# Altium PCB flight controller.PcbDoc (part 1 of 3)
Units mm, origin at the board's own origin, x right, y up, seen from the top; angles counter-clockwise.
Board outline 45 x 47 mm, 6 copper layers (Top Layer, GND Layer, PWR Layer, Layer 4, Layer 5, Bottom Layer), stack 1.786 mm thick; 82 components, 123 nets, 711 pads, 295 vias.
Unrouted connection lines stored in the file: 14.
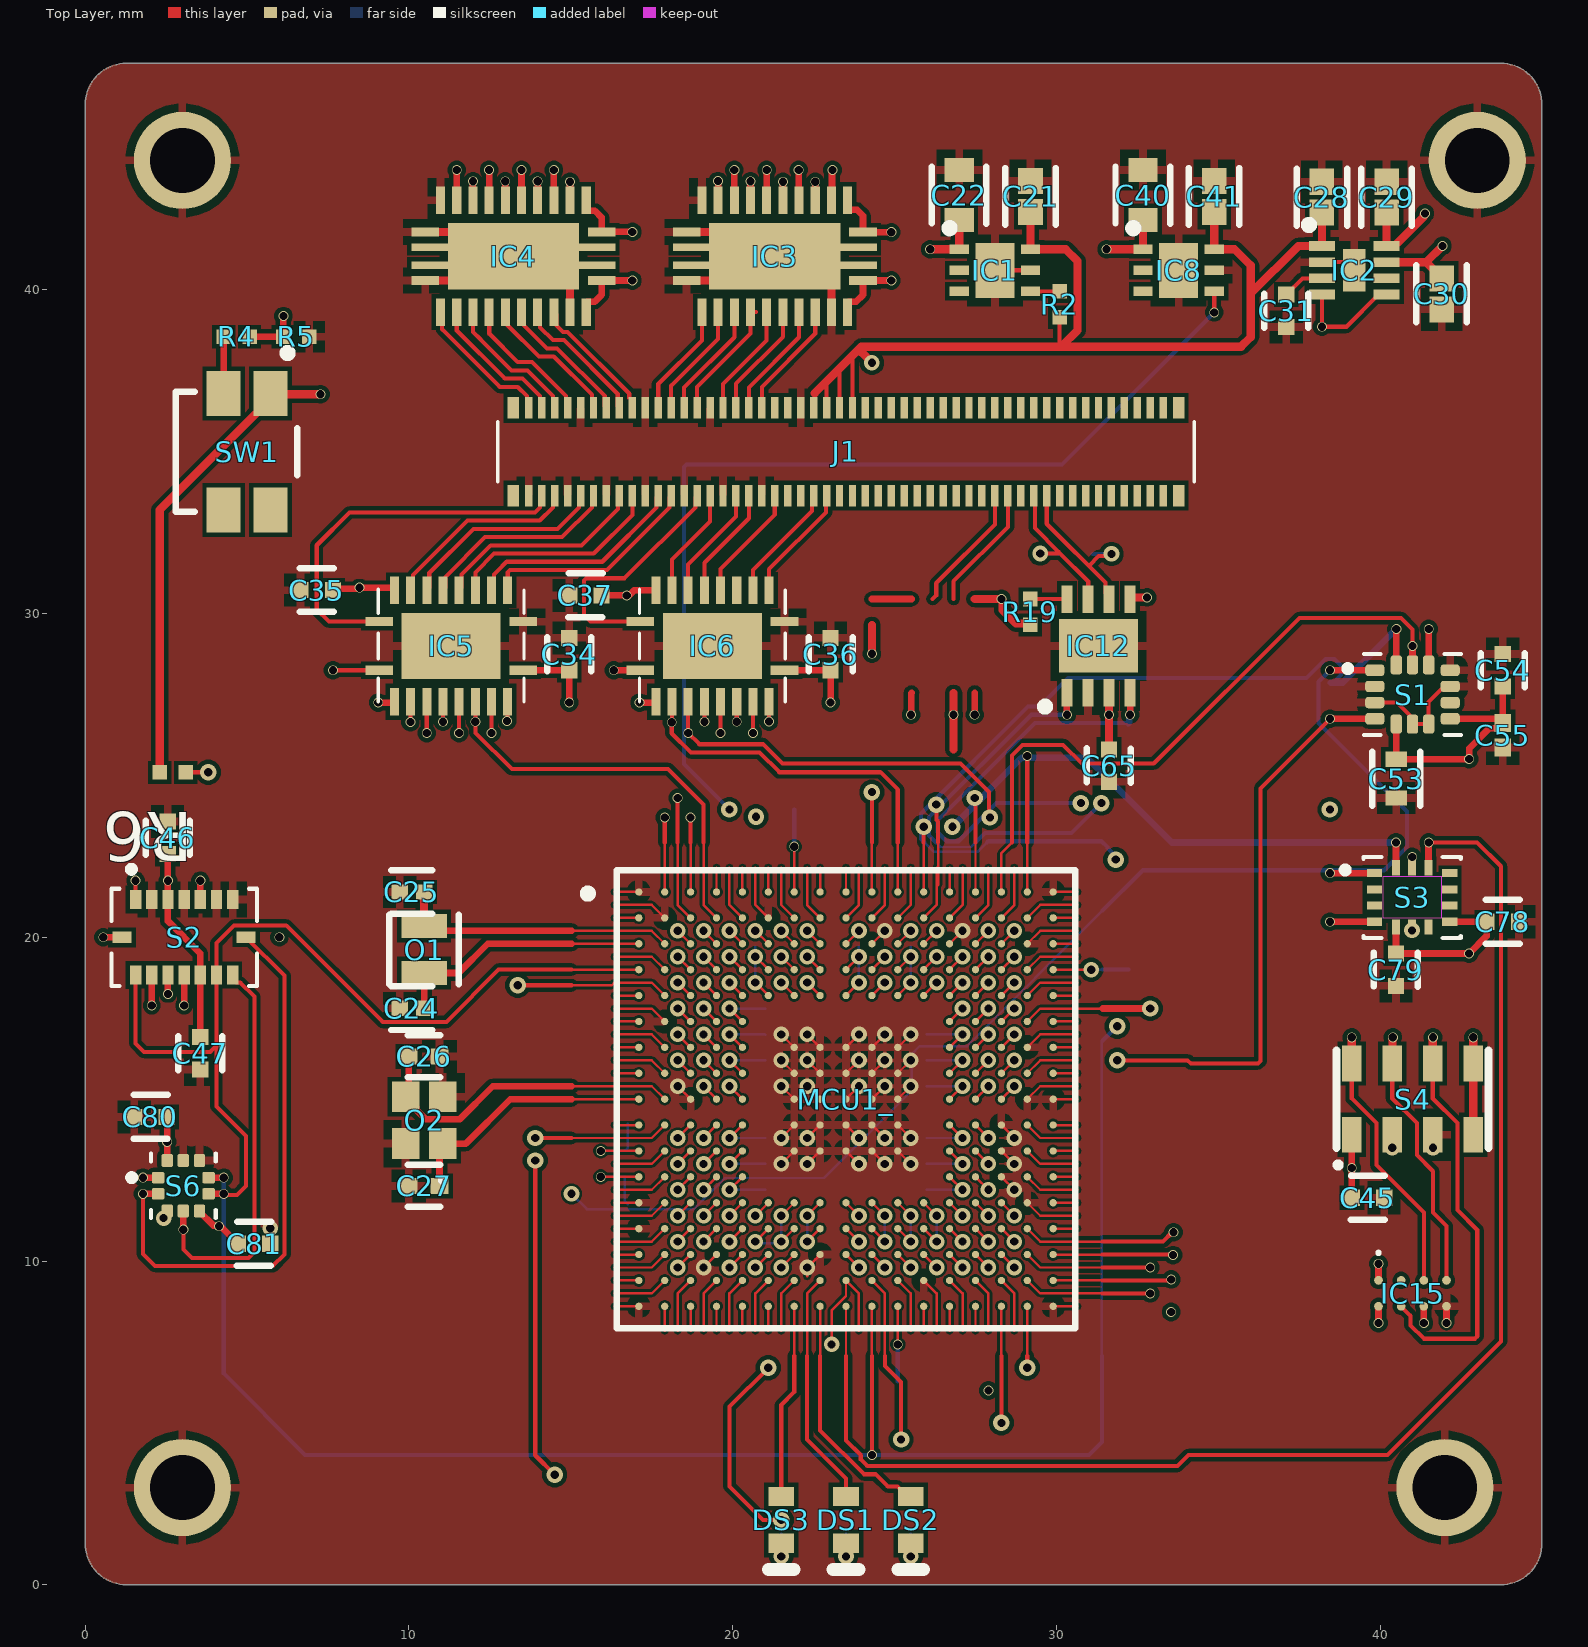
[diagram p0: Top Layer view]
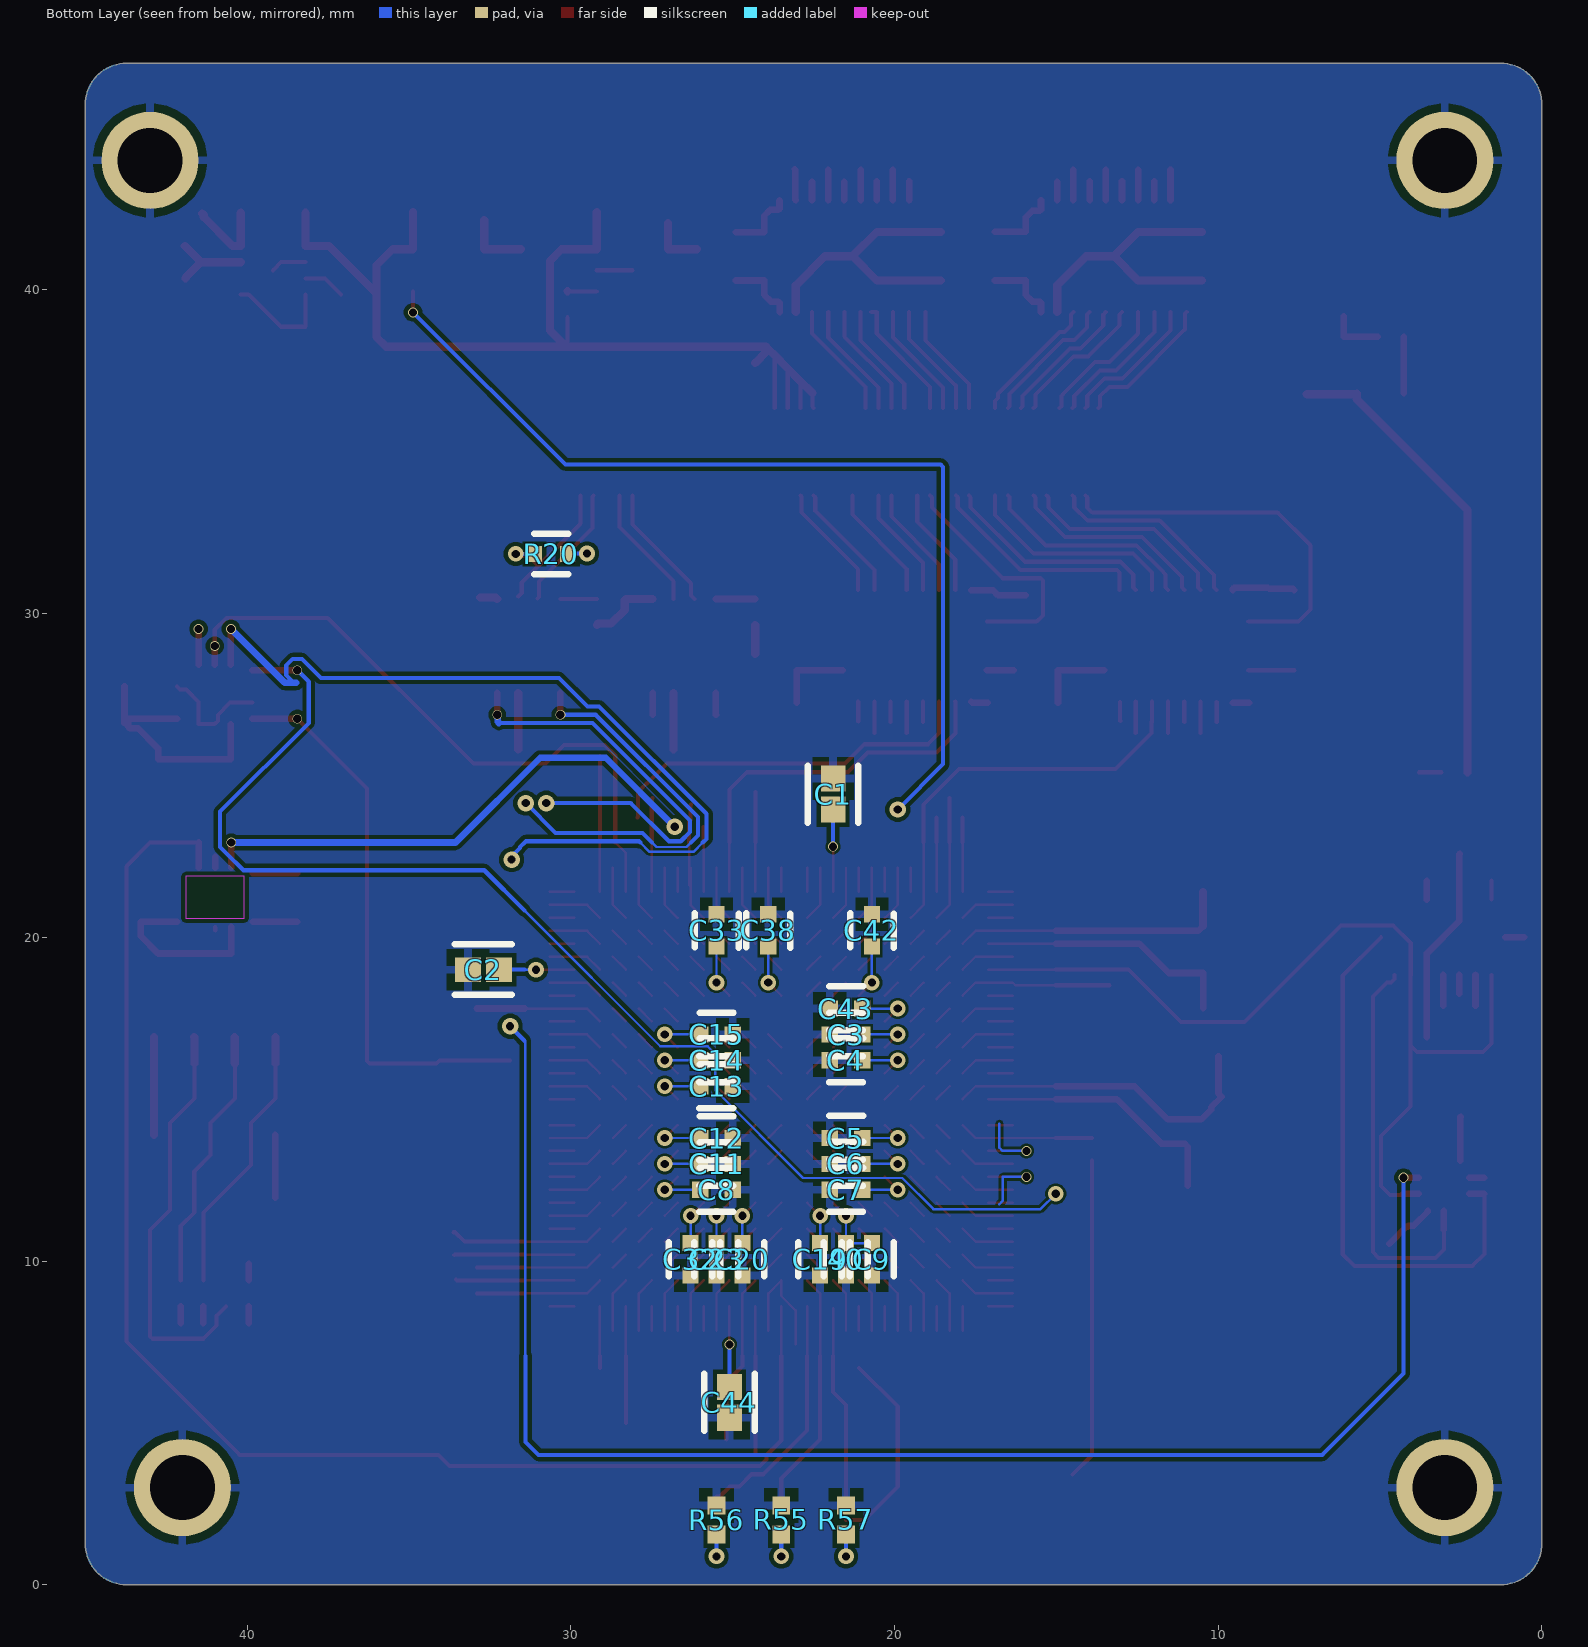
[diagram p1: Bottom Layer view, seen from below]
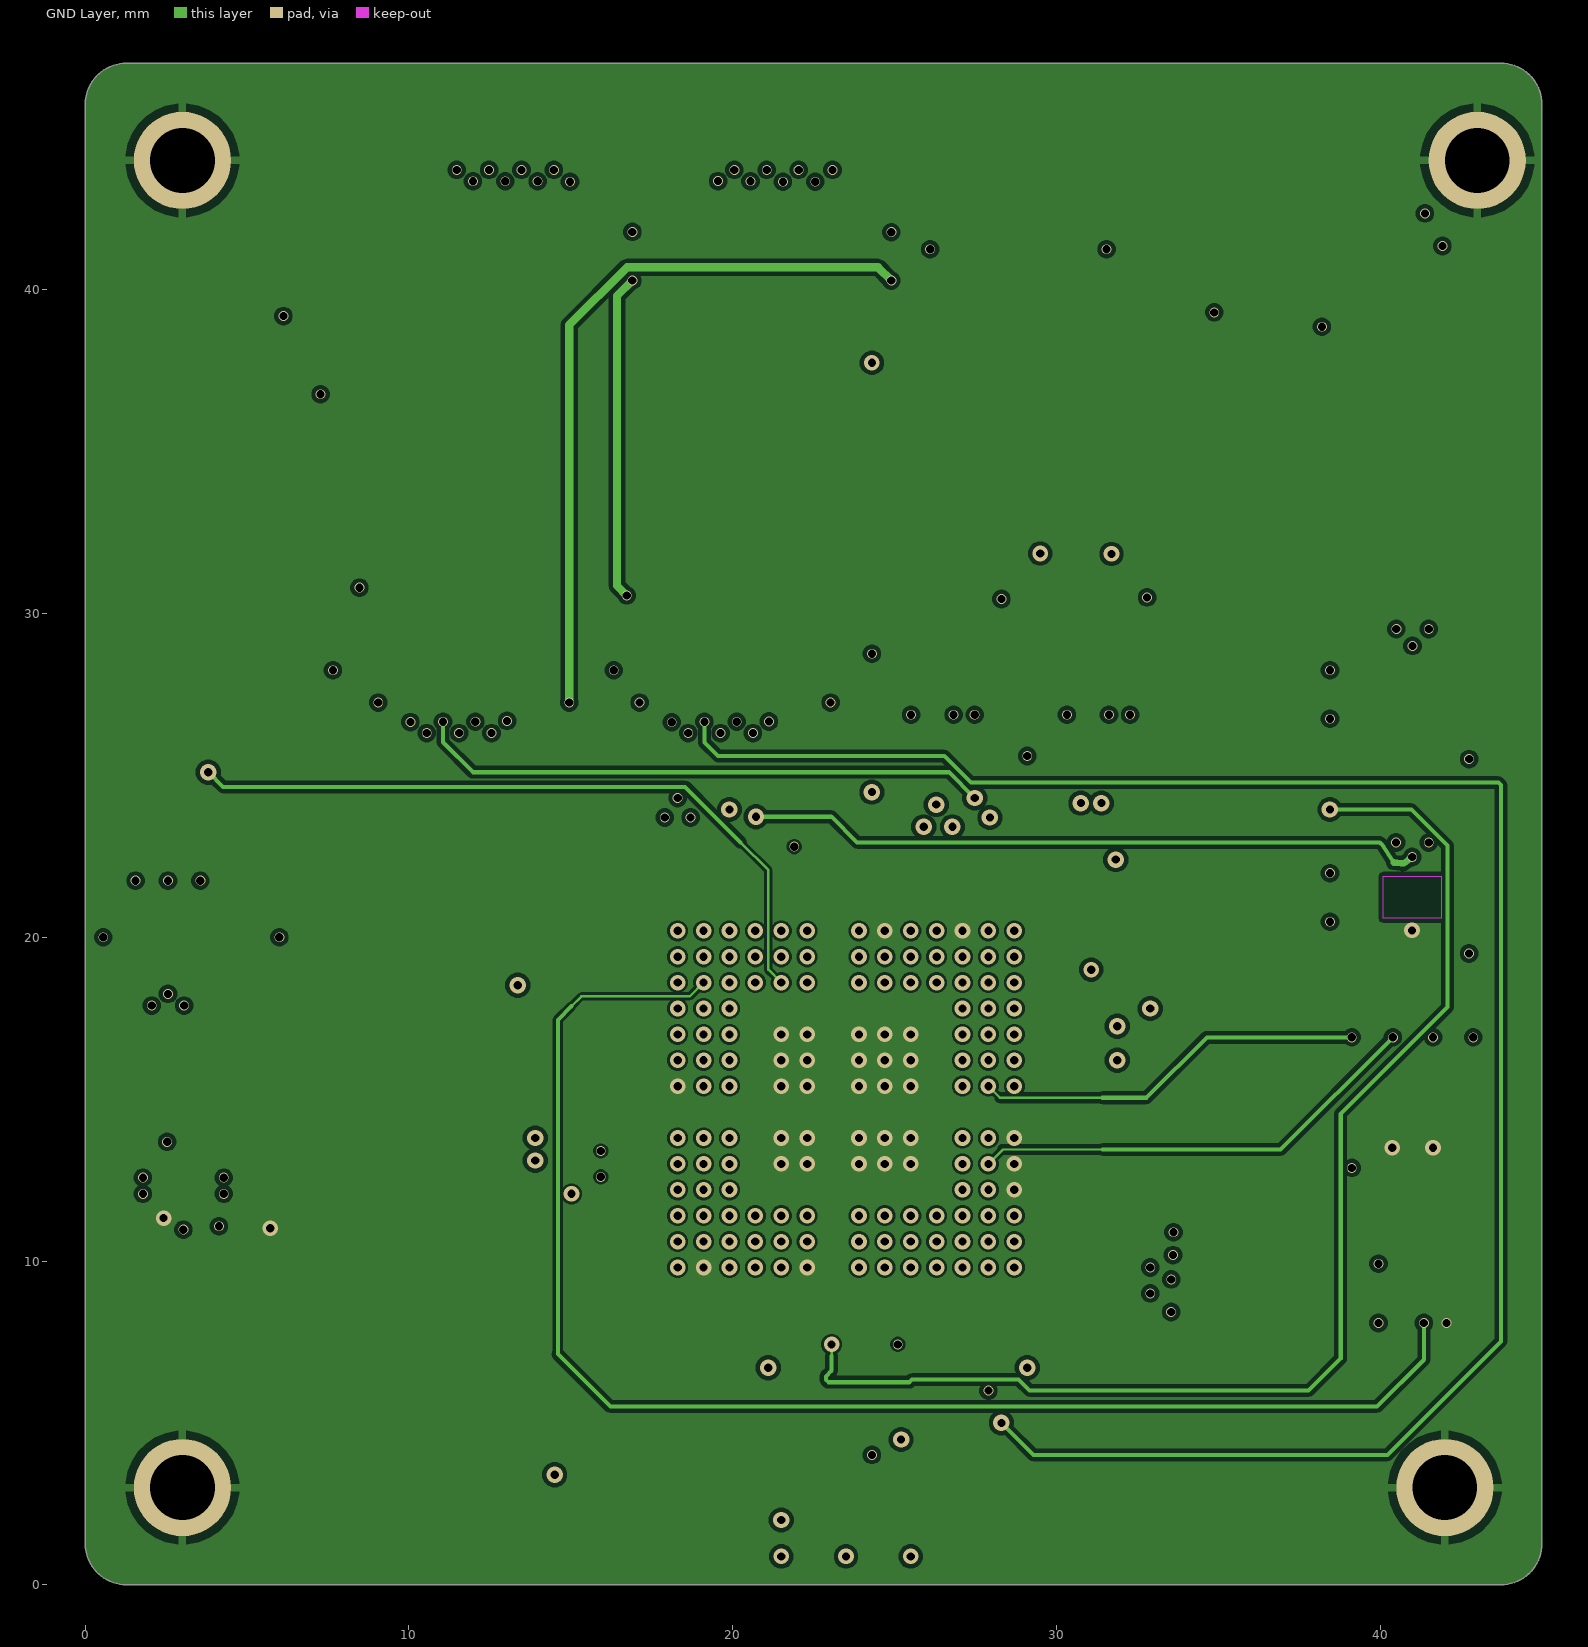
[diagram p2: GND Layer]
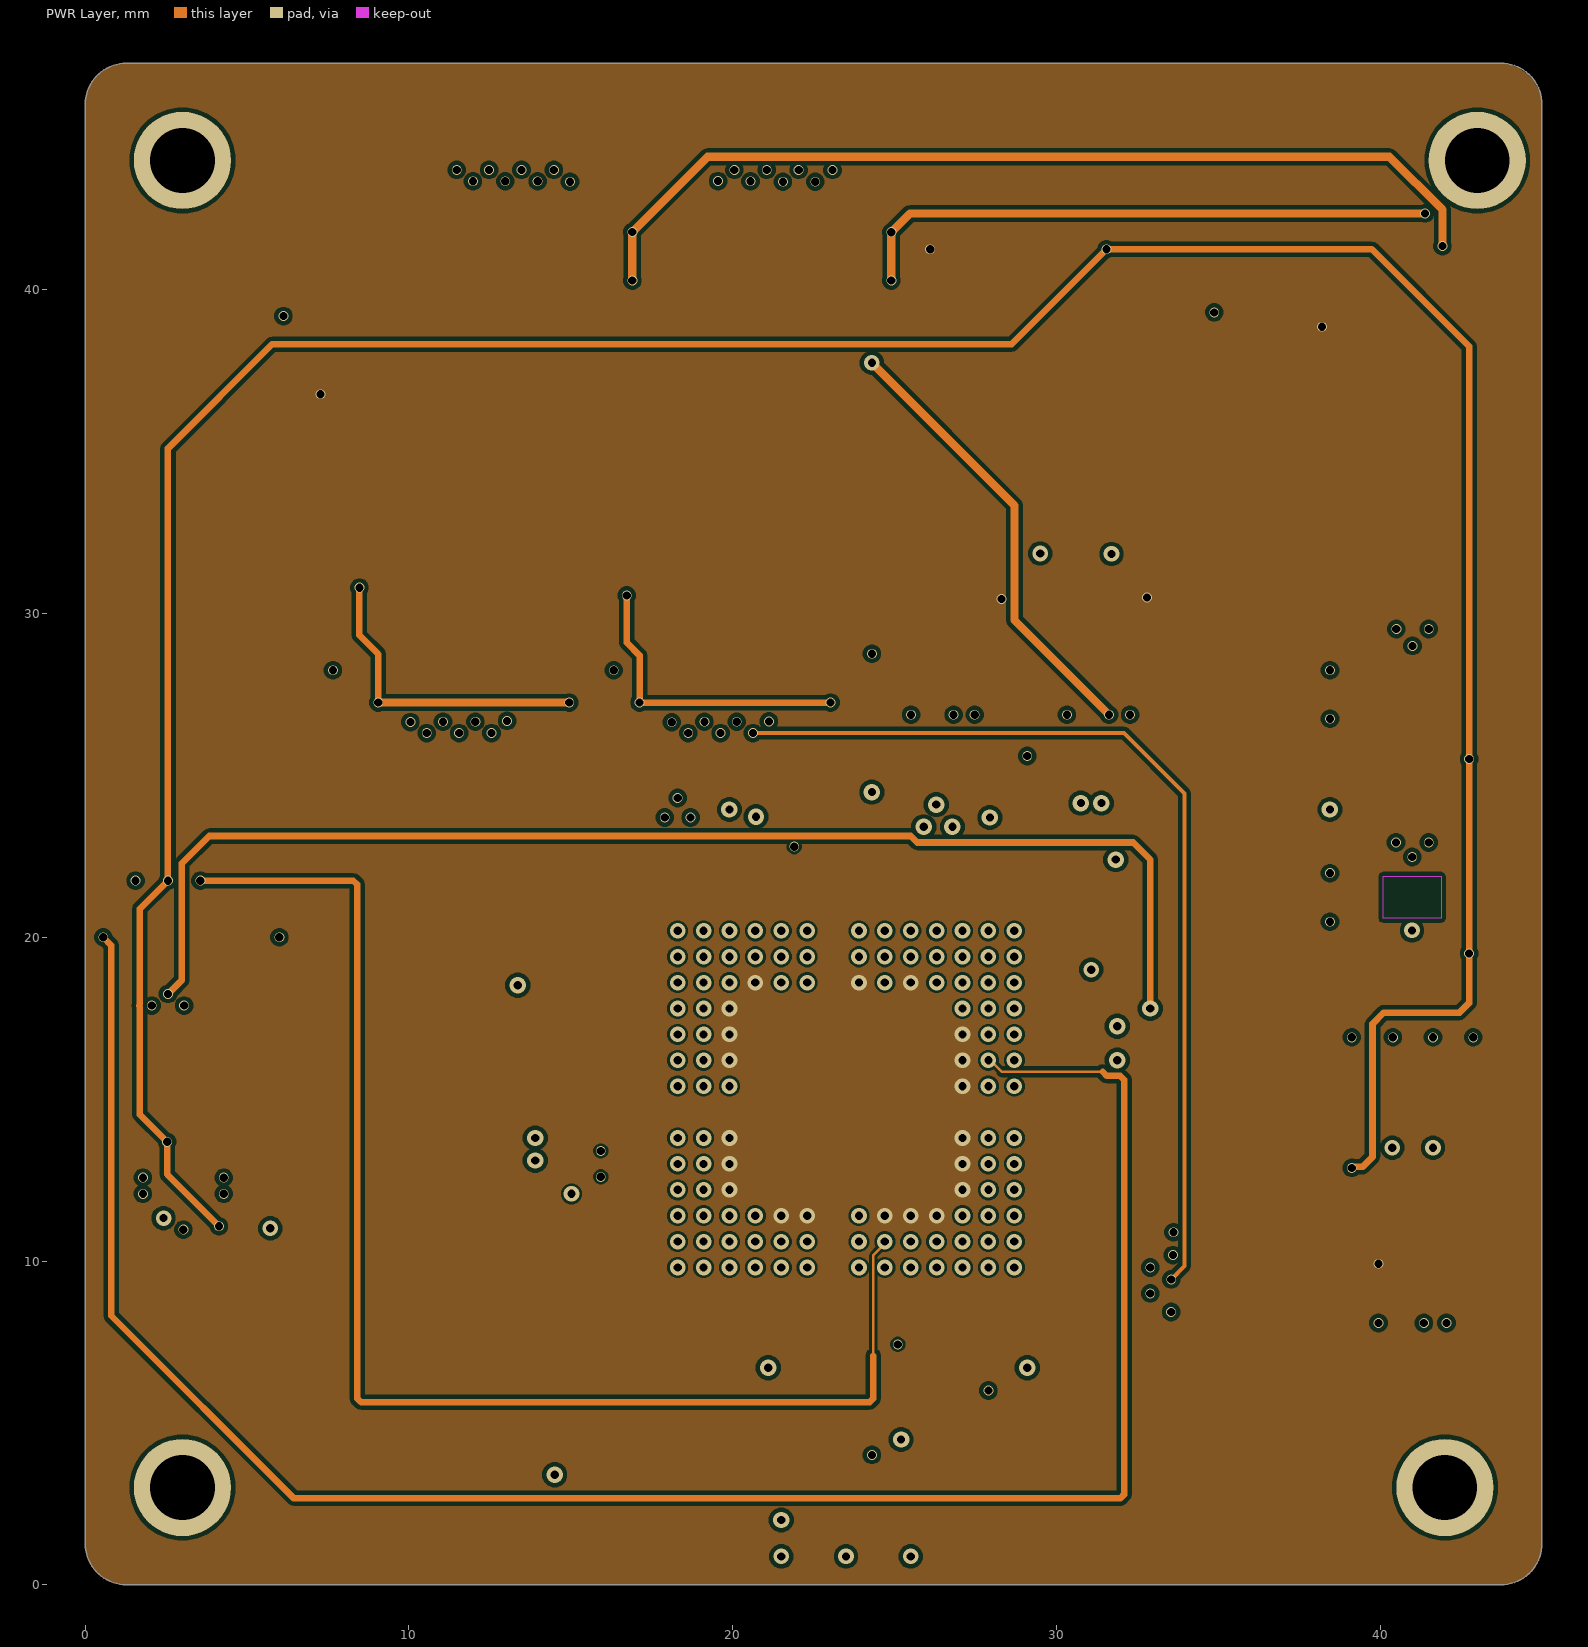
[diagram p3: PWR Layer]
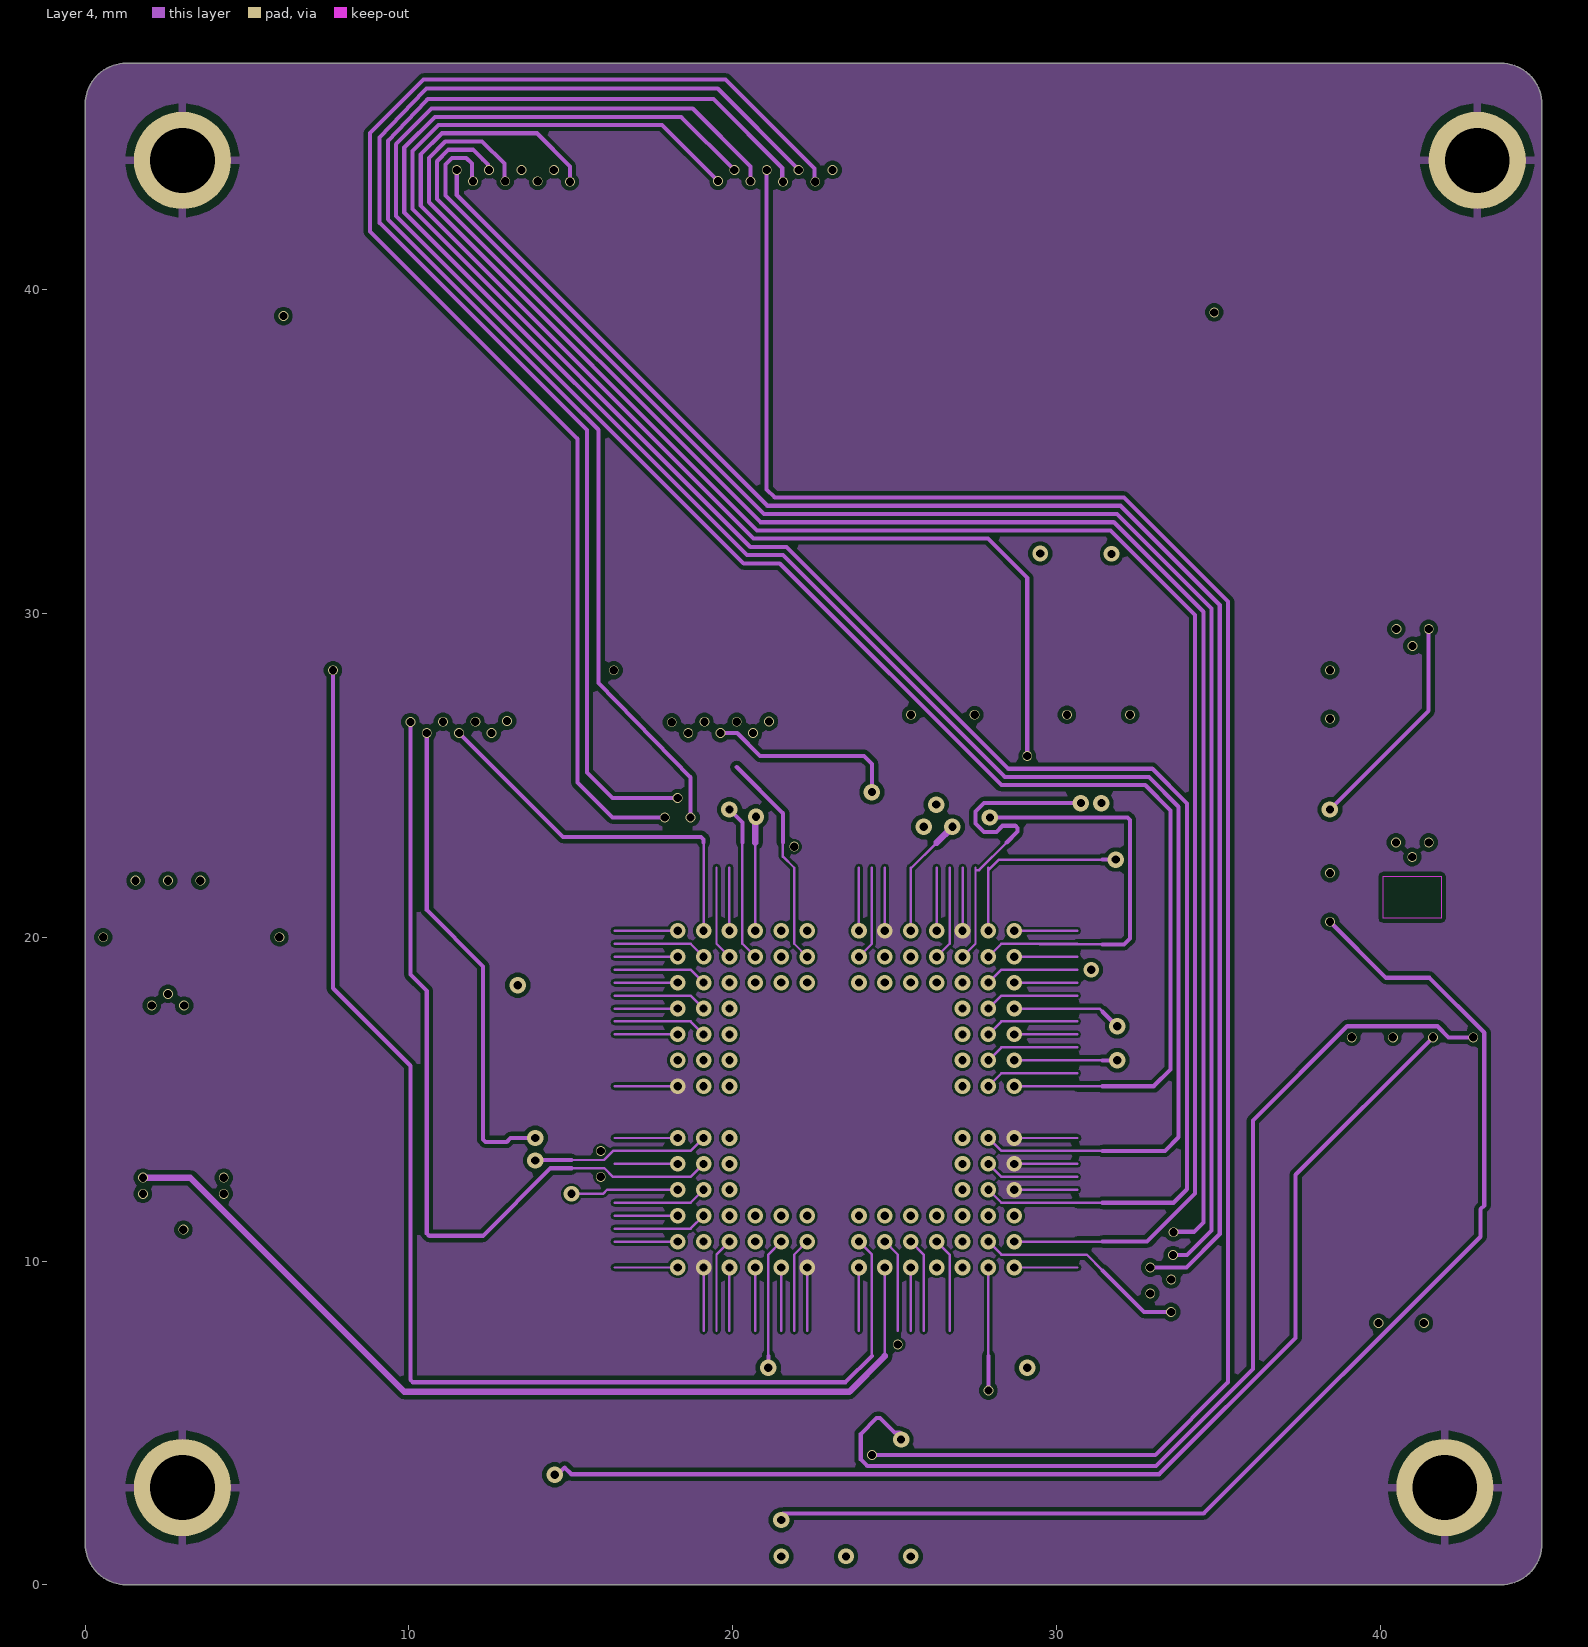
[diagram p4: Layer 4]
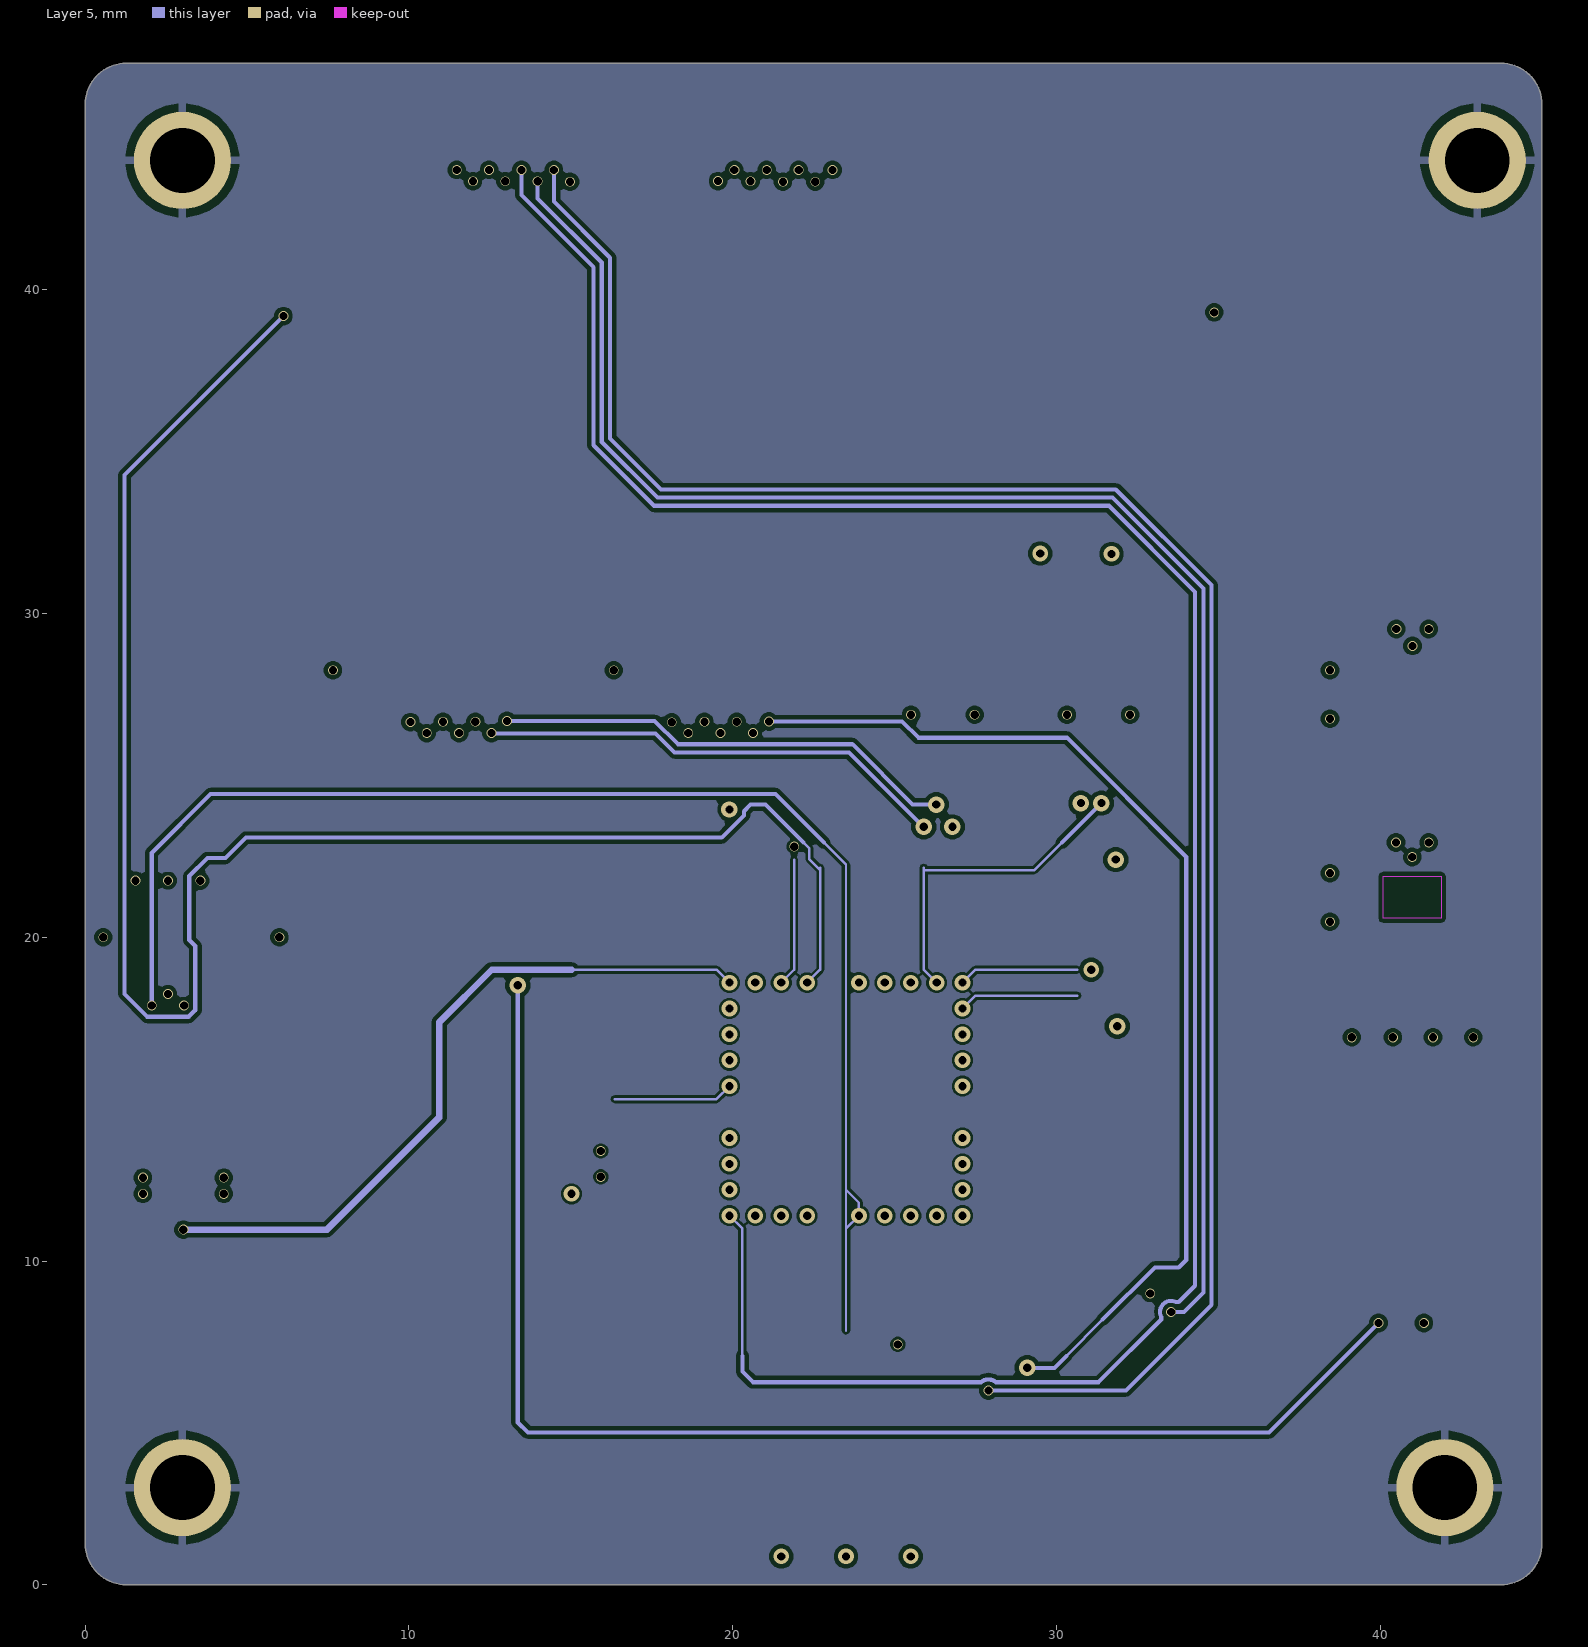
[diagram p5: Layer 5]

## Layer stack, top to bottom
Top Solder: solder mask 0.0127, Solder Resist, Dk 3.3
Top Layer: signal copper 0.035
Dielectric 2: core 0.1524, PP-006, Dk 4.1
GND Layer: signal copper 0.035
Dielectric 4: prepreg 0.254, PP-006, Dk 4.1
PWR Layer: signal copper 0.0356
Dielectric 1: core 0.762, FR-4, Dk 4.5
Layer 4: signal copper 0.0356
Dielectric 5: prepreg 0.254, PP-006, Dk 4.1
Layer 5: signal copper 0.035
Dielectric 3: core 0.1524, PP-006, Dk 4.1
Bottom Layer: signal copper 0.035
Bottom Solder: solder mask 0.0127, Solder Resist, Dk 3.3

## Board outline
0,1.27 ccw(c1.27,1.27) 1.27,0 43.73,0 ccw(c43.73,1.27) 45,1.27 45,45.73 ccw(c43.73,45.73) 43.73,47 1.27,47 ccw(c1.27,45.73) 0,45.73

## Design rules (kind name [scope] priority, off if disabled: settings)
Clearance Clearance_h743 [WithinRoom('h743')] p1: gap=0.076 ignorepadtopadclearanceinfootprint=TRUE
Clearance [All] p2: gap=0.127 ignorepadtopadclearanceinfootprint=TRUE
DiffPairsRouting [All] p1: maxlimit=0.254 minlimit=0.254 mostfreqgap=0.254 toplayer_minwidth=0.254 toplayer_maxwidth=0.254 toplayer_prefwidth=0.254 midlayer1_minwidth=0.254 midlayer1_maxwidth=0.254 midlayer1_prefwidth=0.254 midlayer2_minwidth=0.254 midlayer2_maxwidth=0.254 midlayer2_prefwidth=0.254 midlayer3_minwidth=0.254 midlayer3_maxwidth=0.254 midlayer3_prefwidth=0.254 midlayer4_minwidth=0.254 midlayer4_maxwidth=0.254 midlayer4_prefwidth=0.254 bottomlayer_minwidth=0.254 bottomlayer_maxwidth=0.254 bottomlayer_prefwidth=0.254 maxuncoupledlength=12.7
HoleSize [All] p1: absolutevalues=TRUE maxlimit=7.62 minlimit=0.254 maxpercent=80.000 minpercent=20.000
MinimumAnnularRing [All] p1: minimumring=0.254
PasteMaskExpansion [All] p1: expansion=0.254
PlaneClearance [All] p1: clearance=0.381
PlaneConnect [All] p1: pad.planeconnectstyle=Relief pad.reliefexpansion=0.508 pad.reliefentries=4 pad.reliefconductorwidth=0.254 pad.reliefairgap=0.254 via.planeconnectstyle=Direct via.reliefexpansion=0.508 via.reliefentries=4 via.reliefconductorwidth=0.254 via.reliefairgap=0.254
PolygonConnect [All] p1: thpad.connectstyle=Relief thpad.reliefconductorwidth=0.254 thpad.reliefentries=4 thpad.polygonreliefangle="90 Angle" thpad.airgapwidth=0.254 smdpad.connectstyle=Relief smdpad.reliefconductorwidth=0.254 smdpad.reliefentries=4 smdpad.polygonreliefangle="90 Angle" smdpad.airgapwidth=0.254 via.connectstyle=Direct via.reliefconductorwidth=0.254 via.reliefentries=4 via.polygonreliefangle="90 Angle" via.airgapwidth=0.254
RoomDefinition h743 [InComponentClass('S1_MCU')] p1: confinementstyle=ConfineIn formatcopy=TRUE lockcomponents=TRUE outline 14.521,7.071 14.521,22.929 30.929,22.929 30.929,7.071
RoutingVias RoutingVias_h743 [WithinRoom('h743')] p1: holewidth=0.254 width=0.483 viastyle="Through Hole" minholewidth=0.254 minwidth=0.483 maxholewidth=0.254 maxwidth=0.483
RoutingVias [All] p2: holewidth=0.254 width=0.508 viastyle="Through Hole" minholewidth=0.254 minwidth=0.508 maxholewidth=0.254 maxwidth=0.508
SMDNeckDown [All] p1: percent=100.000
SilkToSolderMaskClearance SilkscreenOverComponentPads [IsPad] p1: minsilkscreentomaskgap=0.254 clearancetoexposedcopper=TRUE
SolderMaskExpansion [All] p1: expansion=0.254 istentingtop=FALSE
SupplyNets "Schematic Supply Nets_8" [InNet('VDD_5V_IN')] p1: voltage=0.000
SupplyNets "Schematic Supply Nets_7" [InNet('VDD_MCU')] p2: voltage=0.000
SupplyNets "Schematic Supply Nets_6" [InNet('GND')] p3: voltage=0.000
SupplyNets "Schematic Supply Nets_5" [InNet('VDD_SENSOR')] p4: voltage=0.000
SupplyNets "Schematic Supply Nets_3" [InNet('IO_3V3_A')] p5: voltage=0.000
SupplyNets "Schematic Supply Nets" [InNet('IO_3V3_B')] p6: voltage=0.000
Width Width_h743 [WithinRoom('h743')] p1: maxlimit=0.076 minlimit=0.076 preferedwidth=0.076
Width [All] p2: maxlimit=0.254 minlimit=0.127 preferedwidth=0.127
24 further rules are at their usual default settings.

## Classes and differential pairs
component class Connector: J1
component class Can: C65 IC12 IC15 R19 R20
component class Pwm: IC3 IC4
component class Barometer: C45 C80 C81 S4 S6
component class Power: C21 C22 C28 C29 C30 C31 C40 C41 DS1 DS2 DS3 IC1 IC2 IC8 R2 R55 R56 R57
component class Imu: C46 C47 C53 C54 C55 C78 C79 S1 S2 S3
component class Uart: C34 C35 C36 C37 IC5 IC6
component class MCU: 40 C1 C2 C3 C4 C5 C6 C7 C8 C9 C11 C12 C13 C14 C15 C19 C20 C23 C24 C25 C26 C27 C32 C33 C38 C42 C43 C44 MCU1_ O1 O2 R4 R5 R6 SW1

## Components (designator, comment, footprint, x,y, rotation, side; value= is the part's Value field where it differs from the comment)
40 "100nF" FP-CC0402-MFG 21.5,10.052 r270 bottom value="100 nF"
C1 "2.2uF" FP-C1005-050-0_15-IPC_A 21.9,24.425 r270 bottom
C2 "2.2uF" FP-C1005-050-0_15-IPC_A 32.7,19 r180 bottom
C3 "100nF" FP-CC0402-MFG 21.5,16.995 r0 bottom value="100 nF"
C4 "100nF" FP-CC0402-MFG 21.5,16.2 r0 bottom value="100 nF"
C5 "100nF" FP-CC0402-MFG 21.5,13.8 r0 bottom value="100 nF"
C6 "100nF" FP-CC0402-MFG 21.5,13 r0 bottom value="100 nF"
C7 "100nF" FP-CC0402-MFG 21.5,12.2 r0 bottom value="100 nF"
C8 "100nF" FP-CC0402-MFG 25.5,12.2 r180 bottom value="100 nF"
C9 "4.7uF" FP-CC0402-MFG 20.7,10.052 r270 bottom value="4.7 uF"
C11 "100nF" FP-CC0402-MFG 25.5,13 r180 bottom value="100 nF"
C12 "100nF" FP-CC0402-MFG 25.5,13.8 r180 bottom value="100 nF"
C13 "100nF" FP-CC0402-MFG 25.5,15.4 r180 bottom value="100 nF"
C14 "100nF" FP-CC0402-MFG 25.5,16.2 r180 bottom value="100 nF"
C15 "100nF" FP-CC0402-MFG 25.5,17 r180 bottom value="100 nF"
C19 "100nF" FP-CC0402-MFG 22.3,10.052 r270 bottom value="100 nF"
C20 "100nF" FP-CC0402-MFG 24.7,10.052 r270 bottom value="100 nF"
C21 "2.2uF" FP-C1005-050-0_15-IPC_A 29.2,42.885 r90 top
C22 "10uF" FP-GRM18-0_15-MFG 27,42.93 r90 top
C23 "100nF" FP-CC0402-MFG 25.5,10.052 r270 bottom value="100 nF"
C24 "8pF" FP-GJM155-0_05-IPC_C 10.089,17.811 r180 top
C25 "8pF" FP-GJM155-0_05-IPC_C 10.089,21.4 r180 top
C26 "12pF" FP-GRM155-0_05-MFG 10.468,16.32 r180 top
C27 "12pF" FP-GRM155-0_05-MFG 10.468,12.319 r180 top
C28 "2.2uF" FP-C1005-050-0_15-IPC_A 38.2,42.862 r90 top
C29 "2.2uF" FP-C1005-050-0_15-IPC_A 40.2,42.862 r90 top
C30 "2.2uF" FP-C1005-050-0_15-IPC_A 41.9,39.878 r270 top
C31 "100nF" FP-CC0402-MFG 37.1,39.355 r270 top value="100 nF"
C32 "100nF" FP-CC0402-MFG 26.3,10.052 r270 bottom value="100 nF"
C33 "100nF" FP-CC0402-MFG 25.5,20.212 r90 bottom value="100 nF"
C34 "100nF" FP-CC0402-MFG 14.95,28.75 r90 top value="100 nF"
C35 "100nF" FP-CC0402-MFG 7.15,30.725 r180 top value="100 nF"
C36 "100nF" FP-CC0402-MFG 23.025,28.75 r90 top value="100 nF"
C37 "100nF" FP-CC0402-MFG 15.45,30.562 r180 top value="100 nF"
C38 "100nF" FP-CC0402-MFG 23.9,20.212 r90 bottom value="100 nF"
C40 "10uF" FP-GRM18-0_15-MFG 32.675,42.93 r90 top
C41 "2.2uF" FP-C1005-050-0_15-IPC_A 34.875,42.885 r90 top
C42 "100nF" FP-CC0402-MFG 20.7,20.212 r90 bottom value="100 nF"
C43 "100nF" FP-CC0402-MFG 21.5,17.8 r0 bottom value="100 nF"
C44 "2.2uF" FP-C1005-050-0_15-IPC_A 25.1,5.635 r90 bottom
C45 "100nF" FP-CC0402-MFG 39.625,11.954 r0 top value="100 nF"
C46 "100nF" FP-CC0402-MFG 2.546,23.075 r90 top value="100 nF"
C47 "100nF" FP-CC0402-MFG 3.554,16.419 r270 top value="100 nF"
C53 "2.2 uF" FP-C1005-050-IPC_A 40.5,24.902 r270 top
C54 "100nF" FP-CC0402-MFG 43.789,28.25 r90 top value="100 nF"
C55 "C0402C103K5RACTU" CAPC1005X55X30LL05T10 43.789,26.24 r270 top
C65 "100nF" FP-CC0402-MFG 31.625,25.305 r270 top value="100 nF"
C78 "100nF" FP-CC0402-MFG 43.789,20.481 r0 top value="100 nF"
C79 "100nF" FP-CC0402-MFG 40.49,19 r270 top value="100 nF"
C80 "100nF" FP-CC0402-MFG 2.015,14.452 r180 top value="100 nF"
C81 "100nF" FP-CC0402-MFG 5.215,10.535 r0 top value="100 nF"
DS1 "TLMS1100-GS08" VISH-TLMX1100_V 23.5,2 r270 top
DS2 "TLMS1100-GS08" VISH-TLMX1100_V 25.5,2 r270 top
DS3 "TLMS1100-GS08" VISH-TLMX1100_V 21.5,2 r270 top
IC1 "LP5912Q3.3DRVRQ1" SON65P200X200X80-7N 28.1,40.605 r0 top
IC2 "MIC5330-SSYML-TR" SON50P200X200X95-9N-D 39.2,40.605 r0 top
IC3 "SN74LVC8T245RHLR" RHL_(R-PVQFN-N24) 21.3,41.04 r180 top
IC4 "SN74LVC8T245RHLR" RHL_(R-PVQFN-N24) 13.225,41.04 r180 top
IC5 "TXS0108ERGYR" SN74LVC541ARGYR 11.3,29 r0 top
IC6 "TXS0108ERGYR" SN74LVC541ARGYR 19.375,29 r0 top
IC8 "LP5912Q3.3DRVRQ1" SON65P200X200X80-7N 33.775,40.605 r0 top
IC12 "TJA1051TK_3_2Z" SON65P300X300X100-9N-D 31.3,29 r90 top
IC15 "M95P32-IXCST_EF" M95P32IXCSTEF 41,9 r90 top
J1 "DF40C-100DP-0.4V_51_" DF40C100DP04V51 23.5,35 r0 top
MCU1_ "STM32H743XIH6" FP-TFBGA240+25-A07U-MFG 23.5,15 r0 top
O1 "ABS06-32.768KHZ-9-1-T" FP-ABS06-MFG 10.468,19.622 r270 top
O2 "Q22FA12800400" Q22FA12800400 10.468,14.352 r90 top
R2 "ERJ2RKF1002X" RESC1005X40X25LL05T05 30.1,39.555 r270 top
R4 "ERJ2RKF2200X" RESC1005X40X25LL05T05 4.675,38.55 r0 top
R5 "ERJ2RKF1002X" RESC1005X40X25LL05T05 6.52,38.55 r180 top
R6 "ERJ2RKF1002X" RESC1005X40X25LL05T05 2.7,25.092 r180 top
R19 "ERJ2RKF1002X" RESC1005X40X25LL05T05 29.195,30.05 r270 top
R20 "ERJ-2RKF1200X" FP-ERJ2RK-MFG 30.609,31.843 r0 bottom
R55 "ERJ-2RKF1001X" RESC1005X40X25NL05T05 23.5,2 r270 bottom
R56 "ERJ-2RKF1001X" RESC1005X40X25NL05T05 25.5,2 r270 bottom
R57 "ERJ-2RKF1001X" RESC1005X40X25NL05T05 21.5,2 r270 bottom
S1 "ICM-42688-P" PQFN50P300X250X97-14N 41,27.5 r0 top
S2 "BMI088" PQFN50P450X300X100-16N 3.055,20 r0 top
S3 "ICM-45686" IC_ICM-45686 40.99,21.231 r0 top
S4 "MS561101BA03-50" MS561101BA03-50 41,15 r90 top
S6 "ICP-20100" PQFN50P200X200X85-10N 3.03,12.325 r0 top
SW1 "EVQ-P7J01P" FP-EVQ-P7J01P-MFG 5,35 r270 top

## Footprints (in the part's own frame and the unit in brackets; to place one, negate y for a bottom-side part, rotate by r counter-clockwise, add the part's x,y. Pads: shape width x height; smd on the part's side, far side on the other; paste and mask are expansions set on the pad)
CAPC1005X55X30LL05T10 [mm] "Chip Capacitor, 2-Leads, Body 1.00x0.50mm, IPC High Density"
  rect 0.56x0.52 smd: 1(-0.38,0) 2(0.38,0)
  body extent -0.53,-0.28 0.53,0.28, height 0.55
DF40C100DP04V51 [mm]
  rect 0.23x0.66 smd: 1(-9.8,-1.355) 2(-9.8,1.355) 3(-9.4,-1.355) 4(-9.4,1.355) 5(-9,-1.355) 6(-9,1.355) 7(-8.6,-1.355) 8(-8.6,1.355) 9(-8.2,-1.355) 10(-8.2,1.355) 11(-7.8,-1.355) 12(-7.8,1.355) 13(-7.4,-1.355) 14(-7.4,1.355) 15(-7,-1.355) 16(-7,1.355) 17(-6.6,-1.355) 18(-6.6,1.355) 19(-6.2,-1.355) 20(-6.2,1.355) 21(-5.8,-1.355) 22(-5.8,1.355) 23(-5.4,-1.355) 24(-5.4,1.355) 25(-5,-1.355) 26(-5,1.355) 27(-4.6,-1.355) 28(-4.6,1.355) 29(-4.2,-1.355) 30(-4.2,1.355) 31(-3.8,-1.355) 32(-3.8,1.355) 33(-3.4,-1.355) 34(-3.4,1.355) 35(-3,-1.355) 36(-3,1.355) 37(-2.6,-1.355) 38(-2.6,1.355) 39(-2.2,-1.355) 40(-2.2,1.355) 41(-1.8,-1.355) 42(-1.8,1.355) 43(-1.4,-1.355) 44(-1.4,1.355) 45(-1,-1.355) 46(-1,1.355) 47(-0.6,-1.355) 48(-0.6,1.355) 49(-0.2,-1.355) 50(-0.2,1.355) 51(0.2,-1.355) 52(0.2,1.355) 53(0.6,-1.355) 54(0.6,1.355) 55(1,-1.355) 56(1,1.355) 57(1.4,-1.355) 58(1.4,1.355) 59(1.8,-1.355) 60(1.8,1.355) 61(2.2,-1.355) 62(2.2,1.355) 63(2.6,-1.355) 64(2.6,1.355) 65(3,-1.355) 66(3,1.355) 67(3.4,-1.355) 68(3.4,1.355) 69(3.8,-1.355) 70(3.8,1.355) 71(4.2,-1.355) 72(4.2,1.355) 73(4.6,-1.355) 74(4.6,1.355) 75(5,-1.355) 76(5,1.355) 77(5.4,-1.355) 78(5.4,1.355) 79(5.8,-1.355) 80(5.8,1.355) 81(6.2,-1.355) 82(6.2,1.355) 83(6.6,-1.355) 84(6.6,1.355) 85(7,-1.355) 86(7,1.355) 87(7.4,-1.355) 88(7.4,1.355) 89(7.8,-1.355) 90(7.8,1.355) 91(8.2,-1.355) 92(8.2,1.355) 93(8.6,-1.355) 94(8.6,1.355) 95(9,-1.355) 96(9,1.355) 97(9.4,-1.355) 98(9.4,1.355) 99(9.8,-1.355) 100(9.8,1.355)
  rect 0.35x0.66 smd: 101(-10.275,1.355) 102(-10.275,-1.355) 103(10.275,-1.355) 104(10.275,1.355)
  silkscreen extent -10.76,-0.93 10.76,0.92
FP-ABS06-MFG [mm]
  rect 0.75x1.4 smd paste+0 mask+0: 1(-0.725,0) 2(0.725,0)
  silkscreen extent -1.07,-1.07 1.08,1.08, body extent -1.2,-0.8 1.2,0.8, height 0.25
FP-C1005-050-0_15-IPC_A [mm]
  rect 0.805x0.76 smd paste+0 mask+0: 1(-0.477,0) 2(0.477,0)
  silkscreen extent -0.88,-0.78 0.88,0.78, body extent -0.5,-0.25 0.5,0.25, height 0.55
FP-C1005-050-IPC_A [mm]
  rect 0.472x0.672 smd paste+0 mask+0: 1(-0.6,0) 2(0.6,0)
  silkscreen extent -0.84,-0.74 0.84,0.74, body extent -0.5,-0.25 0.5,0.25, height 0.55
FP-CC0402-MFG [mm]
  rect 0.5x0.5 smd paste+0 mask+0: 1(-0.5,0) 2(0.5,0)
  silkscreen extent -0.53,-0.68 0.52,0.67, body extent -0.5,-0.25 0.5,0.25, height 0.55
FP-ERJ2RK-MFG [mm]
  rect 0.475x0.5 smd paste+0 mask+0: 1(-0.513,0) 2(0.513,0)
  silkscreen extent -0.53,-0.62 0.52,0.62, body extent -0.5,-0.25 0.5,0.25, height 0.4
FP-EVQ-P7J01P-MFG [mm]
  rect 1.4x1.05 smd paste+0 mask+0: 1(-1.8,0.725) 1'(1.8,0.725) 2(-1.8,-0.725) 2'(1.8,-0.725)
  silkscreen extent -3.17,-2.2 1.85,1.55, body extent -2.6,-2.3 2.6,1.65, height 0.25
FP-GJM155-0_05-IPC_C [mm]
  rect 0.515x0.472 smd paste+0 mask+0: 1(-0.379,0) 2(0.379,0)
  silkscreen extent -0.64,-0.68 0.64,0.67, body extent -0.74,-0.38 0.74,0.38, height 0.25
FP-GRM18-0_15-MFG [mm]
  rect 0.75x0.9 smd paste+0 mask+0: 1(-0.775,0) 2(0.775,0)
  silkscreen extent -0.88,-0.83 0.88,0.85, body extent -0.8,-0.4 0.8,0.4, height 0.95
FP-GRM155-0_05-MFG [mm]
  rect 0.55x0.5 smd paste+0 mask+0: 1(-0.475,0) 2(0.475,0)
  silkscreen extent -0.5,-0.65 0.5,0.65, body extent -0.85,-0.38 0.85,0.38, height 0.25
FP-TFBGA240+25-A07U-MFG [mm]
  round 0.225 smd paste-1000 mask+0: A1(-6.4,6.4) A2(-5.6,6.4) A3(-4.8,6.4) A4(-4,6.4) A5(-3.2,6.4) A6(-2.4,6.4) A7(-1.6,6.4) A8(-0.8,6.4) A9(0,6.4) A10(0.8,6.4) A11(1.6,6.4) A12(2.4,6.4) A13(3.2,6.4) A14(4,6.4) A15(4.8,6.4) A16(5.6,6.4) A17(6.4,6.4) B1(-6.4,5.6) B2(-5.6,5.6) B3(-4.8,5.6) B4(-4,5.6) B5(-3.2,5.6) B6(-2.4,5.6) B7(-1.6,5.6) B8(-0.8,5.6) B9(0,5.6) B10(0.8,5.6) B11(1.6,5.6) B12(2.4,5.6) B13(3.2,5.6) B14(4,5.6) B15(4.8,5.6) B16(5.6,5.6) B17(6.4,5.6) C1(-6.4,4.8) C2(-5.6,4.8) C3(-4.8,4.8) C4(-4,4.8) C5(-3.2,4.8) C6(-2.4,4.8) C7(-1.6,4.8) C8(-0.8,4.8) C9(0,4.8) C10(0.8,4.8) C11(1.6,4.8) C12(2.4,4.8) C13(3.2,4.8) C14(4,4.8) C15(4.8,4.8) C16(5.6,4.8) C17(6.4,4.8) D1(-6.4,4) D2(-5.6,4) D3(-4.8,4) D4(-4,4) D5(-3.2,4) D6(-2.4,4) D7(-1.6,4) D8(-0.8,4) D9(0,4) D10(0.8,4) D11(1.6,4) D12(2.4,4) D13(3.2,4) D14(4,4) D15(4.8,4) D16(5.6,4) D17(6.4,4) E1(-6.4,3.2) E2(-5.6,3.2) E3(-4.8,3.2) E4(-4,3.2) E5(-3.2,3.2) E6(-2.4,3.2) E7(-1.6,3.2) E8(-0.8,3.2) E9(0,3.2) E10(0.8,3.2) E11(1.6,3.2) E12(2.4,3.2) E13(3.2,3.2) E14(4,3.2) E15(4.8,3.2) E16(5.6,3.2) E17(6.4,3.2) F1(-6.4,2.4) F2(-5.6,2.4) F3(-4.8,2.4) F4(-4,2.4) F5(-3.2,2.4) F13(3.2,2.4) F14(4,2.4) F15(4.8,2.4) F16(5.6,2.4) F17(6.4,2.4) G1(-6.4,1.6) G2(-5.6,1.6) G3(-4.8,1.6) G4(-4,1.6) G5(-3.2,1.6) G7(-1.6,1.6) G8(-0.8,1.6) G9(0,1.6) G10(0.8,1.6) G11(1.6,1.6) G13(3.2,1.6) G14(4,1.6) G15(4.8,1.6) G16(5.6,1.6) G17(6.4,1.6) H1(-6.4,0.8) H2(-5.6,0.8) H3(-4.8,0.8) H4(-4,0.8) H5(-3.2,0.8) H7(-1.6,0.8) H8(-0.8,0.8) H9(0,0.8) H10(0.8,0.8) H11(1.6,0.8) H13(3.2,0.8) H14(4,0.8) H15(4.8,0.8) H16(5.6,0.8) H17(6.4,0.8) J1(-6.4,0) J2(-5.6,0) J3(-4.8,0) J4(-4,0) J5(-3.2,0) J7(-1.6,0) J8(-0.8,0) J9(0,0) J10(0.8,0) J11(1.6,0) J13(3.2,0) J14(4,0) J15(4.8,0) J16(5.6,0) J17(6.4,0) K1(-6.4,-0.8) K2(-5.6,-0.8) K3(-4.8,-0.8) K4(-4,-0.8) K5(-3.2,-0.8) K7(-1.6,-0.8) K8(-0.8,-0.8) K9(0,-0.8) K10(0.8,-0.8) K11(1.6,-0.8) K13(3.2,-0.8) K14(4,-0.8) K15(4.8,-0.8) K16(5.6,-0.8) K17(6.4,-0.8) L1(-6.4,-1.6) L2(-5.6,-1.6) L3(-4.8,-1.6) L4(-4,-1.6) L5(-3.2,-1.6) L7(-1.6,-1.6) L8(-0.8,-1.6) L9(0,-1.6) L10(0.8,-1.6) L11(1.6,-1.6) L13(3.2,-1.6) L14(4,-1.6) L15(4.8,-1.6) L16(5.6,-1.6) L17(6.4,-1.6) M1(-6.4,-2.4) M2(-5.6,-2.4) M3(-4.8,-2.4) M4(-4,-2.4) M5(-3.2,-2.4) M13(3.2,-2.4) M14(4,-2.4) M15(4.8,-2.4) M16(5.6,-2.4) M17(6.4,-2.4) N1(-6.4,-3.2) N2(-5.6,-3.2) N3(-4.8,-3.2) N4(-4,-3.2) N5(-3.2,-3.2) N6(-2.4,-3.2) N7(-1.6,-3.2) N8(-0.8,-3.2) N9(0,-3.2) N10(0.8,-3.2) N11(1.6,-3.2) N12(2.4,-3.2) N13(3.2,-3.2) N14(4,-3.2) N15(4.8,-3.2) N16(5.6,-3.2) N17(6.4,-3.2) P1(-6.4,-4) P2(-5.6,-4) P3(-4.8,-4) P4(-4,-4) P5(-3.2,-4) P6(-2.4,-4) P7(-1.6,-4) P8(-0.8,-4) P9(0,-4) P10(0.8,-4) P11(1.6,-4) P12(2.4,-4) P13(3.2,-4) P14(4,-4) P15(4.8,-4) P16(5.6,-4) P17(6.4,-4) R1(-6.4,-4.8) R2(-5.6,-4.8) R3(-4.8,-4.8) R4(-4,-4.8) R5(-3.2,-4.8) R6(-2.4,-4.8) R7(-1.6,-4.8) R8(-0.8,-4.8) R9(0,-4.8) R10(0.8,-4.8) R11(1.6,-4.8) R12(2.4,-4.8) R13(3.2,-4.8) R14(4,-4.8) R15(4.8,-4.8) R16(5.6,-4.8) R17(6.4,-4.8) T1(-6.4,-5.6) T2(-5.6,-5.6) T3(-4.8,-5.6) T4(-4,-5.6) T5(-3.2,-5.6) T6(-2.4,-5.6) T7(-1.6,-5.6) T8(-0.8,-5.6) T9(0,-5.6) T10(0.8,-5.6) T11(1.6,-5.6) T12(2.4,-5.6) T13(3.2,-5.6) T14(4,-5.6) T15(4.8,-5.6) T16(5.6,-5.6) T17(6.4,-5.6) U1(-6.4,-6.4) U2(-5.6,-6.4) U3(-4.8,-6.4) U4(-4,-6.4) U5(-3.2,-6.4) U6(-2.4,-6.4) U7(-1.6,-6.4) U8(-0.8,-6.4) U9(0,-6.4) U10(0.8,-6.4) U11(1.6,-6.4) U12(2.4,-6.4) U13(3.2,-6.4) U14(4,-6.4) U15(4.8,-6.4) U16(5.6,-6.4) U17(6.4,-6.4)
  silkscreen extent -8.1,-7.08 7.08,7.08, body extent -7,-7 7,7, height 1.1
IC_ICM-45686 [mm]
  rect 0.475x0.25 smd mask+0.05: 1(-1.162,0.75) 2(-1.162,0.25) 3(-1.162,-0.25) 4(-1.162,-0.75) 8(1.163,-0.75) 9(1.163,-0.25) 10(1.163,0.25) 11(1.163,0.75)
  rect 0.25x0.475 smd mask+0.05: 5(-0.5,-0.912) 6(0,-0.912) 7(0.5,-0.912) 12(0.5,0.913) 13(0,0.913) 14(-0.5,0.913)
  Keep-Out Layer region: 0.9,-0.65 -0.9,-0.65 -0.9,0.65 0.9,0.65
  silkscreen extent -2.17,-1.25 1.5,1.25, body extent -1.5,-1.25 1.5,1.25, height 0.86
M95P32IXCSTEF [mm]
  round 0.268 smd: 1(0.4,1.05) 2(-0.4,1.05) 3(0.4,0.35) 4(-0.4,0.35) 5(0.4,-0.35) 6(-0.4,-0.35) 7(0.4,-1.05) 8(-0.4,-1.05)
  silkscreen extent 1.2,1 1.3,1.1, body extent -0.77,-1.3 0.77,1.3, height 0.55
MS561101BA03-50 [mm]
  rect 1.1x0.6 smd: 1(-1.1,1.875) 2(-1.1,0.625) 3(-1.1,-0.625) 4(-1.1,-1.875) 5(1.1,-1.875) 6(1.1,-0.625) 7(1.1,0.625) 8(1.1,1.875)
  silkscreen extent -2.08,-2.35 1.5,2.35, body extent -1.5,-2.5 1.5,2.5, height 0.95
PQFN50P200X200X85-10N [mm]
  rrect25% 0.39x0.35 smd: 1(-0.78,0.25) 2(-0.78,-0.25) 6(0.78,-0.25) 7(0.78,0.25)
  rrect25% 0.35x0.39 smd: 3(-0.5,-0.78) 4(0,-0.78) 5(0.5,-0.78) 8(0.5,0.78) 9(0,0.78) 10(-0.5,0.78)
  silkscreen extent -1.69,-1 1,1, body extent -1,-1 1,1, height 0.85
PQFN50P300X250X97-14N [mm]
  rrect50% 0.59x0.35 smd mask+0: 1(-1.165,0.75) 2(-1.165,0.25) 3(-1.165,-0.25) 4(-1.165,-0.75) 8(1.165,-0.75) 9(1.165,-0.25) 10(1.165,0.25) 11(1.165,0.75)
  rrect50% 0.35x0.59 smd mask+0: 5(-0.5,-0.915) 6(0,-0.915) 7(0.5,-0.915) 12(0.5,0.915) 13(0,0.915) 14(-0.5,0.915)
  silkscreen extent -2.1,-1.25 1.5,1.25
PQFN50P450X300X100-16N [mm]
  rect 0.35x0.59 smd: 1(-1.5,1.165) 2(-1,1.165) 3(-0.5,1.165) 4(0,1.165) 5(0.5,1.165) 6(1,1.165) 7(1.5,1.165) 9(1.5,-1.165) 10(1,-1.165) 11(0.5,-1.165) 12(0,-1.165) 13(-0.5,-1.165) 14(-1,-1.165) 15(-1.5,-1.165)
  rect 0.59x0.35 smd: 8(1.915,0) 16(-1.915,0)
  silkscreen extent -2.25,-1.5 2.25,2.2
Q22FA12800400 [mm]
  rect 0.95x0.85 smd: 1(-0.725,-0.575) 2(0.725,-0.575) 3(0.725,0.575) 4(-0.725,0.575)
  silkscreen extent -1.9,-0.62 -1.8,-0.53, body extent -1.11,-0.91 1.11,0.91, height 0.6
RESC1005X40X25LL05T05 [mm] "Chip Resistor, 2-Leads, Body 1.05x0.55mm, IPC High Density"
  rect 0.45x0.45 smd: 1(-0.4,0) 2(0.4,0)
  body extent -0.53,-0.28 0.53,0.28, height 0.4
RESC1005X40X25NL05T05 [mm] "Chip Resistor, 2-Leads, Body 1.05x0.55mm, IPC Medium Density"
  rect 0.55x0.55 smd: 1(-0.45,0) 2(0.45,0)
  body extent -0.53,-0.28 0.53,0.28, height 0.4
RHL_(R-PVQFN-N24) [mm]
  rect 0.85x0.28 smd: 1(-2.725,-0.75) 12(2.725,-0.75) 13(2.725,0.75) 24(-2.725,0.75)
  rect 0.28x0.85 smd: 2(-2.25,-1.725) 3(-1.75,-1.725) 4(-1.25,-1.725) 5(-0.75,-1.725) 6(-0.25,-1.725) 7(0.25,-1.725) 8(0.75,-1.725) 9(1.25,-1.725) 10(1.75,-1.725) 11(2.25,-1.725) 14(2.25,1.725) 15(1.75,1.725) 16(1.25,1.725) 17(0.75,1.725) 18(0.25,1.725) 19(-0.25,1.725) 20(-0.75,1.725) 21(-1.25,1.725) 22(-1.75,1.725) 23(-2.25,1.725)
  rect 4.05x2.05 smd: 25(0,0)
  rect 1.125x0.23 smd: 26(2.587,-0.275) 27(2.587,0.275) 28(-2.587,0.275) 29(-2.587,-0.275)
  body extent -2.75,-1.75 2.75,1.75, height 1
SN74LVC541ARGYR [mm]
  rect 0.85x0.28 smd: 1(-2.225,-0.75) 10(2.225,-0.75) 11(2.225,0.75) 20(-2.225,0.75)
  rect 0.28x0.85 smd: 2(-1.75,-1.725) 3(-1.25,-1.725) 4(-0.75,-1.725) 5(-0.25,-1.725) 6(0.25,-1.725) 7(0.75,-1.725) 8(1.25,-1.725) 9(1.75,-1.725) 12(1.75,1.725) 13(1.25,1.725) 14(0.75,1.725) 15(0.25,1.725) 16(-0.25,1.725) 17(-0.75,1.725) 18(-1.25,1.725) 19(-1.75,1.725)
  rect 3.05x2.05 smd: 21(0,0)
  silkscreen extent -2.25,-1.72 2.25,1.75, body extent -2.25,-1.75 2.25,1.75, height 1
SON50P200X200X95-9N-D [mm]
  rect 0.8x0.3 smd: 1(-1,0.75) 2(-1,0.25) 3(-1,-0.25) 4(-1,-0.75) 5(1,-0.75) 6(1,-0.25) 7(1,0.25) 8(1,0.75)
  rect 0.7x1.3 smd: 9(0,0)
  silkscreen extent -1.52,1.28 -1.27,1.52, body extent -1.05,-1 1.05,1, height 0.95
SON65P200X200X80-7N [mm]
  rect 0.6x0.3 smd: 1(-1.1,0.65) 2(-1.1,0) 3(-1.1,-0.65) 4(1.1,-0.65) 5(1.1,0) 6(1.1,0.65)
  rect 1.2x1.7 smd: 7(0,0)
  silkscreen extent -1.52,1.18 -1.27,1.42, body extent -1.05,-1 1.05,1, height 0.8
SON65P300X300X100-9N-D [mm]
  rect 0.85x0.35 smd: 1(-1.45,0.975) 2(-1.45,0.325) 3(-1.45,-0.325) 4(-1.45,-0.975) 5(1.45,-0.975) 6(1.45,-0.325) 7(1.45,0.325) 8(1.45,0.975)
  rect 1.65x2.45 smd: 9(0,0)
  silkscreen extent -2,1.52 -1.75,1.77, body extent -1.55,-1.5 1.55,1.5, height 1
VISH-TLMX1100_V [mm] "SMD, 2-Leads, Body 1.6x0.8mm"
  rect 0.6x0.8 smd: 1(-0.725,0) 2(0.725,0)
  silkscreen extent 1.53,-0.4 1.53,0.4, body extent -0.8,-0.4 0.8,0.4, height 0.65

## Part data
40 C3 C4 C5 C6 C7 C8 C11 C12 C13 C14 C15 C19 C20 C23 C31 C32 C33 C34 C35 C36 C37 C38 C42 C43 C45 C46 C47 C54 C65 C78 C79 C80 C81: library part CMP-03422-001121-1, "CAP CER 0.1UF 16V X7R 0402", Capacitance="100 nF", Manufacturer=YAGEO, Manufacturer Part Number=CC0402KPX7R7BB104, Package=CC0402, Temperature="-55°C to +125°C", Temperature Characteristic=X7R, Temperature Coefficient=30ppm/°C, Temperature Range High=+125°C, Temperature Range Low=-55°C, Tolerance=0.1, Voltage Rating="16 V", Automotive=No, Automotive Grade=NA, Category=Cap, ComponentLink2Description=Datasheet, ComponentLink2URL=http://www.yageo.com/documents/recent/UPY-GP_NP0_16V-to-50V_16.pdf, Device Class L1="Passive Components", Device Class L2=Capacitors, Device Class L3="Ceramic Capacitors", Digikey Description="CAP CER 0.1UF 16V X7R 0402", Footprint Url=http://www.yageo.com/exep/pages/download/literatures/UPY-C_GEN_24.pdf, Height=0.55mm, Ipc Land Pattern Name=CAPC10050X50, Lead Free=Yes, Material=Ceramic, Mouser Description="0402 0.1 uF 16 V ±10% Tolerance X7R SMT Multilayer Ceramic Capacitor", Octopart=https://octopart.com/cc0402kpx7r7bb104-yageo-21548559, RoHS=TRUE
C1 C2 C21 C28 C29 C30 C41 C44: library part CMP-08246-007153-1, "CAP CER 2.2UF 35V X5R 0402", Case Code (Imperial)=0402, Case Code (Metric)=1005, Dielectric=X5R, Dielectric Material=Ceramic, Max Operating Temperature=85°C, Min Operating Temperature=-55°C, Package Quantity=1, Tolerance=10%, Voltage Rating=35V, Capacitance=2.2uF, Case/Package=0402, Depth=0.5mm, Height=0.5mm, Lead Free="Lead Free", Length=1mm, Mount="Surface Mount", Packaging="Tape and Reel", REACH SVHC="No SVHC", Resistor Type=Ceramic, RoHS Compliant=Yes, Series=C, Termination=SMD/SMT, Thickness=0.022inch, Voltage Rating (DC)=35V, Weight=2.3E-05oz, Width=0.5mm
C9: library part CMP-1034-02137-2, "CAP CER 4.7UF 6.3V X5R 0402", Capacitance="4.7 uF", Manufacturer=YAGEO, Manufacturer Part Number=CC0402MRX5R5BB475, Package=CC0402, Temperature="-55°C to +125°C", Temperature Characteristic=X5R, Temperature Coefficient=30ppm/°C, Temperature Range High=+125°C, Temperature Range Low=-55°C, Tolerance=0.2, Voltage Rating="6.3 V", Automotive=No, Automotive Grade=NA, Category=Cap, ComponentLink2Description=Datasheet, ComponentLink2URL=http://www.yageo.com/documents/recent/UPY-GP_NP0_16V-to-50V_16.pdf, Device Class L1="Passive Components", Device Class L2=Capacitors, Device Class L3="Ceramic Capacitors", Digikey Description="CAP CER 4.7UF 6.3V X5R 0402", Footprint Url=http://www.yageo.com/exep/pages/download/literatures/UPY-C_GEN_24.pdf, Height=0.55mm, Ipc Land Pattern Name=CAPC10050X50, Lead Free=Yes, Material=Ceramic, Mouser Description="Multilayer Ceramic Capacitors MLCC - SMD/SMT 4.7uF 6.3V X5R 20%", Octopart=https://octopart.com/cc0402mrx5r5bb475-yageo-20021081, RoHS=TRUE
C22 C40: library part CMP-2000-05448-2, "CAP CER 10UF 10V X5R 0603", Manufacturer=Murata, Manufacturer Part Number=GRM188R61A106KE69D, Package=GRM18-0.15, Temperature="-55°C to +85°C", Temperature Characteristic=X5R, Temperature Coefficient=15%, Temperature Range High=+85°C, Temperature Range Low=-55°C, Tolerance=10%, Voltage Rating=10V, Automotive=No, Capacitance=10uF, Category=Cap, ComponentLink2Description=Datasheet, ComponentLink2URL=https://search.murata.co.jp/Ceramy/image/img/A01X/G101/ENG/GRM188R61A106KE69-01A.pdf, Device Class L1="Passive Components", Device Class L2=Capacitors, Device Class L3="Ceramic Capacitors", Digikey Description="CAP CER 10UF 10V X5R 0603", Height=0.95mm, Lead Free=Yes, Material=Ceramic, Mouser Description="Multilayer Ceramic Capacitors MLCC - SMD/SMT 0603 10uF 10volts X5R + - 10%", Octopart=https://octopart.com/grm188r61a106ke69d-murata-22851381, RoHS=TRUE
C24 C25: library part CMP-2008-03759-2, "Multi-Layer Ceramic Capacitor 8pF C0G  ±0.25pF 0402 Paper T/R", Case Code (Imperial)=0402, Case Code (Metric)=1005, Dielectric=C0G, Max Operating Temperature=125°C, Min Operating Temperature=-55°C, Package Quantity=1, Voltage Rating=50V, Capacitance=8pF, Case/Package=0402, Depth=0.5mm, Height=0.5mm, Lead Free="Lead Free", Length=1mm, Mount="Surface Mount", Packaging="Tape and Reel", Radiation Hardening=No, Termination=SMD/SMT, Thickness=0.022inch, Voltage Rating (DC)=50V, Width=0.02inch
C26 C27: library part CMP-2008-03945-2, "CAP CER 12PF 50V C0G/NP0 0402", Case Code (Imperial)=0402, Case Code (Metric)=1005, Dielectric=C0G, Max Operating Temperature=125°C, Min Operating Temperature=-55°C, Package Quantity=10000, Tolerance=2%, Voltage=50V, Capacitance=12pF, Case/Package=0402, Construction=Flat, Depth=0.5mm, Height=0.5mm, Lead Free="Lead Free", Length=1mm, Material=Ceramic, Mount="Surface Mount", Packaging="Tape and Reel", Radiation Hardening=No, REACH SVHC="No SVHC", Series=GRM, Termination=SMD/SMT, Thickness=0.022inch, Voltage Rating=50V, Voltage Rating (DC)=50V, Width=0.5mm
C53: library part CMP-08246-004339-1, "CAP CER 2.2UF 25V X5R 0402", Capacitance=2.2uF, Case Code (Imperial)=0402, Case Code (Metric)=1005, Dielectric=X5R, Dielectric Material=Ceramic, Max Operating Temperature=85°C, Min Operating Temperature=-55°C, Package Quantity=1, Tolerance=10%, Voltage Rating=25V, Case/Package=0402, Depth=0.5mm, Height=0.5mm, Lead Free="Lead Free", Length=1mm, Mount="Surface Mount", Packaging="Tape and Reel", REACH SVHC="No SVHC", Resistor Type=Ceramic, RoHS Compliant=Yes, Series=C, Termination=SMD/SMT, Thickness=0.022inch, Voltage Rating (DC)=25V, Weight=2.3E-05oz, Width=0.5mm
C55: library part CMP-1034-01886-2, Manufacturer=Kemet, Part Number=C0402C103K5RACTU
DS1 DS2 DS3: library part CMP-1666-00027-1, "LED, RED, 2.1 V, -40 to 100 degC, 2-Pin SMD (0603), RoHS, Tape and Reel", Capacitance="12 pF", Case Code (Imperial)=0603, Case Code (Metric)=1608, Max Operating Temperature=125degC, Min Operating Temperature=-55degC, Package Quantity=4000, Resistance="100000000000 Ohm", Tolerance=5%, Type (Capacitors)=C0G, Voltage Rating="50 V", Case/Package=0603, ComponentLink1Description="Manufacturer URL", ComponentLink1URL=http://www.vishay.com/, ComponentLink2Description=Datasheet, ComponentLink2URL=http://www.vishay.com/docs/83173/tlmb1100.pdf, DatasheetVersion="Rev. 2.7, 03/2016", Height="0.8 mm", Length="1.6 mm", Mount="Surface Mount", PackageDescription="2-Pin Surface Mount Device, Body 1.6 x 0.8 mm", PackageReference=TLMX1100, Packaging="Tape and Reel", Pins=2, Radiation Hardening=No, REACH SVHC="No SVHC", RoHSCompliant=True, Voltage Rating (DC)="50 V", Width="0.8 mm"
IC1 IC8: "Integrated Circuit", Manufacturer_Name="Texas Instruments", Mouser Part Number=595-LP5912Q3.3DRVRQ1, Datasheet Link=http://www.ti.com/lit/gpn/lp5912-q1, Height=0.8mm, Manufacturer_Part_Number=LP5912Q3.3DRVRQ1, Mouser Price/Stock=https://www.mouser.co.uk/ProductDetail/Texas-Instruments/LP5912Q3.3DRVRQ1?qs=n%252BTO0c4TDSb%252BK5JhyfAoLw%3D%3D
IC2: "Integrated Circuit", Manufacturer_Name=Microchip, Mouser Part Number=998-MIC5330-SSYMLTR, Arrow Part Number=MIC5330-SSYML-TR, Arrow Price/Stock=https://www.arrow.com/en/products/mic5330-ssyml-tr/microchip-technology?region=nac, Datasheet Link=http://www.microchip.com/mymicrochip/filehandler.aspx?ddocname=en579824, Height=0.95mm, Manufacturer_Part_Number=MIC5330-SSYML-TR, Mouser Price/Stock=https://www.mouser.co.uk/ProductDetail/Microchip-Technology/MIC5330-SSYML-TR?qs=U6T8BxXiZAVlV%252Bccuslf5g%3D%3D
IC3 IC4: "Integrated Circuit", Manufacturer_Name="Texas Instruments", Mouser Part Number=595-SN74LVC8T245RHLR, Arrow Part Number=SN74LVC8T245RHLR, Arrow Price/Stock=https://www.arrow.com/en/products/sn74lvc8t245rhlr/texas-instruments?region=nac, Datasheet Link=http://www.ti.com/lit/gpn/sn74lvc8t245, Manufacturer_Part_Number=SN74LVC8T245RHLR, Mouser Price/Stock=https://www.mouser.co.uk/ProductDetail/Texas-Instruments/SN74LVC8T245RHLR?qs=dT9u2OTAaVWMeuErzytHQg%3D%3D
IC5 IC6: "Integrated Circuit", Manufacturer_Name="Texas Instruments", Mouser Part Number=595-TXS0108ERGYR, Arrow Part Number=TXS0108ERGYR, Arrow Price/Stock=https://www.arrow.com/en/products/txs0108ergyr/texas-instruments?utm_currency=USD&region=nac, Datasheet Link=http://www.ti.com/lit/gpn/txs0108e, Height=1mm, Manufacturer_Part_Number=TXS0108ERGYR, Mouser Price/Stock=https://www.mouser.co.uk/ProductDetail/Texas-Instruments/TXS0108ERGYR?qs=dqESbKqT1jau1kZv8JPj9Q%3D%3D
IC12: library part TJA1051TK_3, "Integrated Circuit", Manufacturer_Name=NXP, Manufacturer_Part_Number=TJA1051TK/3, Mouser Part Number=N/A, Datasheet Link=https://www.nxp.com/docs/en/data-sheet/TJA1051.pdf, Height=1mm, Mouser Price/Stock=https://www.mouser.co.uk/ProductDetail/NXP-Semiconductors/TJA1051TK-3?qs=fAHHVMwC%252BbjHKozSeK7tBA%3D%3D
IC15: "Integrated Circuit", Arrow Part Number=M95P32-IXCST/EF, Manufacturer_Name=STMicroelectronics, Mouser Part Number=511-M95P32-IXCST/EF, Arrow Price/Stock=https://www.arrow.com/en/products/m95p32-ixcstef/stmicroelectronics?utm_currency=USD&region=nac, Datasheet Link=https://www.st.com/resource/en/datasheet/m95p32-i.pdf, Height=0.58mm, Manufacturer_Part_Number=M95P32-IXCST/EF, Mouser Price/Stock=https://www.mouser.co.uk/ProductDetail/STMicroelectronics/M95P32-IXCST-EF?qs=rQFj71Wb1eVk689cPUP7pg%3D%3D
J1: library part CMP-002-00076-1, "HIROSE(HRS) - DF40C-100DP-0.4V(51) - CONN, STACKING, HEADER, 100POS, 2ROW", Manufacturer_Name=Hirose, Manufacturer_Part_Number=DF40C-100DP-0.4V(51), Mouser Part Number=798-DF40C100DP0.4V51, Datasheet Link=https://datasheet.datasheetarchive.com/originals/distributors/SFDatasheet-7/sf-000141247.pdf, Design Item ID=DF40C-100DP-0.4V_51_, Geometry.Height=1mm, Mouser Price/Stock=https://www.mouser.co.uk/ProductDetail/Hirose-Connector/DF40C-100DP-0.4V51?qs=eDUdFcBPps2TxbrE27%2Ff2A%3D%3D, Source=DF40C-100DP-0.4V_51_.SchLib
MCU1_: library part CMP-12105-000122-1, "IC MCU 32BIT 2MB FLASH TFBGA", Case/Package=TFBGA, Frequency=400MHz, Max Operating Temperature=85°C, Min Operating Temperature=-40°C, Core Architecture=ARM, Interface=I2C, Memory Size=2MB, Memory Type=FLASH, Number Of I/Os=168, Oscillator Type=Internal, Packaging=Tray, Peripherals="Brown-out Detect/Reset", RoHS Compliant=Yes
O1: library part CMP-27762-003430-2, "Crystal 32.768kHz ±10ppm (Tol) 9pF FUND 90kΩ 2-Pin Mini-CSMD T/R", Case/Package=CSMD, ESR (Equivalent Series Resistance)=90kR, Frequency=32.768kHz, Frequency Tolerance=10ppm, Load Capacitance=9pF, Max Operating Temperature=85°C, Min Operating Temperature=-40°C, Package Quantity=3000, Depth=1.2mm, Height=0.6mm, Length=2mm, Mount="Surface Mount", Number of Pins=2, Packaging="Tape and Reel", Radiation Hardening=No, REACH SVHC="No SVHC", RoHS Compliant=Yes, Series=ABS06, Series Resistance=90kR, Termination=SMD/SMT, Tolerance=10ppm, Width=1.2mm
O2: "Crystal or Oscillator", Manufacturer_Name="Seiko Epson Corporation", Datasheet Link=https://datasheet.lcsc.com/szlcsc/Seiko-Epson-Q22FA12800400_C255875.pdf, Height=0.5mm, Manufacturer_Part_Number=Q22FA12800400
R2 R5 R6 R19: library part CMP-2000-07588-1, "Chip Resistor, 10 KOhm, +/- 1%, 0.1 W, -55 to 155 degC, 0402 (1005 Metric), RoHS, Tape and Reel", Case Code (Imperial)=0402, Case Code (Metric)=1005, Manufacturer=Panasonic, Max Operating Temperature=155degC, Max Power Dissipation=100mW, Min Operating Temperature=-55degC, Package Description="2-Pin Surface Mount Device, Body 1 x 0.5 mm", Package Quantity=1, Package Reference=402, Resistance=10KOhm, Temperature Coefficient=100ppm\/degreesC, Tolerance=1%, Voltage Rating=50V, Case\/Package=0402, Composition=ThickFilm, Contact Plating=Tin, Datasheet URL=https://industrial.panasonic.com/cdbs/www-data/pdf/RDA0000/AOA0000C304.pdf, Datasheet Version=02/2017, Depth=0.5mm, Height=0.35mm, Lead Free=LeadFree, Length=1mm, Manufacturer URL=http://www.panasonic.com/, Military Standard=Not, Mount=SurfaceMount, Mounting Technology=SurfaceMount, Number of Pins=2, Number of Terminations=2, Packaging=TapeandReel, Power Rating=100mW, Radiation Hardening=No, REACH SVHC=NoSVHC, RoHSCompliant=True, Termination=SMD/SMT, Voltage Rating (DC)=50V, Width=0.02inch
R4: library part CMP-2002-01131-1, Manufacturer=Panasonic, Part Number=ERJ2RKF2200X
R20: library part CMP-2002-00645-2, "RES SMD 120 OHM 1% 1/10W 0402", Case Code (Imperial)=0402, Case Code (Metric)=1005, Max Operating Temperature=155°C, Max Power Dissipation=100mW, Min Operating Temperature=-55°C, Package Quantity=10000, Resistance=120R, Resistor Type="Thick Film", Temperature Coefficient=100ppm/°C, Tolerance=1%, Voltage Rating=50V, Case/Package=0402, Contact Plating=Tin, Depth=0.5mm, Features="Automotive AEC-Q200", Height=0.35mm, Lead Free="Lead Free", Length=1mm, Military Standard=Not, Mount="Surface Mount", Number of Pins=2, Number of Terminations=2, Packaging="Cut Tape", Power Rating=100mW, Radiation Hardening=No, REACH SVHC="No SVHC", RoHS Compliant=Yes, Series=ERJ-2Rx, Technology="THICK FILM", Termination=SMD/SMT, Voltage Rating (DC)=50V, Weight=0.000388oz, Width=0.5mm
R55 R56 R57: library part CMP-1011-00510-4, "Chip Resistor, 1 KOhm, +/- 1%, 100 mW, -55 to 155 degC, 0402 (1005 Metric), RoHS, Tape and Reel", Case Code (Imperial)=0402, Case Code (Metric)=1005, Manufacturer="Basic Passives", Max Operating Temperature="155 degC", Min Operating Temperature="-55 degC", Package Quantity=10000, Power Rating="100 mW", Resistance="1 KOhm", Tolerance=1%, Voltage Rating="50 V", Case\/Package=0402, ComponentLink1Description="Manufacturer URL", ComponentLink1URL=http://www.panasonic.com/, ComponentLink2Description=Datasheet, ComponentLink2URL=http://industrial.panasonic.com/cdbs/www-data/pdf/RDA0000/AOA0000C86.pdf, DatasheetVersion=04/2015, Height="0.35 mm", Length="1 mm", Mount="Surface Mount", Mounting Technology="Surface Mount", PackageDescription="2-Pin Surface Mount Device, Body 1 x 0.5 mm", PackageReference=0402, Packaging="Tape and Reel", PartNumber=ERJ-2RKF1001X, Pins=2, Radiation Hardening=No, REACH SVHC=Yes, RoHSCompliant=true, Width="0.5 mm"
S1: library part CMP-010-00026-1, "Accelerometer, Gyroscope, 6 Axis Sensor Output", Case/Package=None, Availability=Unavailable, Component Type=Standard, Design Item ID=ICM-42688-P, MP=ICM-42688-P, Pins=14, Price=None, Source=ICM-42688-P.SchLib
S2: library part CMP-010-00024-1, "High-performance 6-axis inertial sensor (accelerometer + gyroscope) <a href=\"https://pricing.snapeda.com/parts/BMI088/Bosch%20Sensortec/view-part?ref=eda\">Check prices</a>", Case/Package=None, Availability=Unavailable, Component Type=Standard, Design Item ID=BMI088, MP=BMI088, Pins=16, Price=None, Source=BMI088.SchLib
S3: library part CMP-010-00025-1, "Accelerometer, Gyroscope, 6 Axis Sensor I2C, I3C, SPI Output", Case/Package=Package, Check_prices=https://www.snapeda.com/parts/ICM-45686/TDK+InvenSense/view-part/?ref=eda, Component Type=Standard, Design Item ID=ICM-45686, MF="TDK InvenSense", MP=ICM-45686, Pins=14, SnapEDA_Link=https://www.snapeda.com/parts/ICM-45686/TDK+InvenSense/view-part/?ref=snap, Source=ICM-45686.SchLib
S4: "Integrated Circuit", Manufacturer_Name="TE Connectivity", Mouser Part Number=824-MS561101BA03-50, Arrow Part Number=MS561101BA03-50, Arrow Price/Stock=https://www.arrow.com/en/products/ms561101ba03-50/te-connectivity?region=nac, Datasheet Link=https://www.te.com/commerce/DocumentDelivery/DDEController?Action=srchrtrv&DocNm=MS5611-01BA03&DocType=Data%20Sheet&DocLang=English&PartCntxt=MS561101BA03-50&DocFormat=pdf, Manufacturer_Part_Number=MS561101BA03-50, Mouser Price/Stock=https://www.mouser.co.uk/ProductDetail/Measurement-Specialties/MS561101BA03-50?qs=%252BgKeJhng5iV%252BnCz6Qd5iDw%3D%3D
S6: library part CMP-010-00027-1, Case/Package=None, Availability="Not in stock", Check_prices=https://www.snapeda.com/parts/ICP-20100/TDK%20InvenSense/view-part/7331147/?ref=eda, Component Type=Standard, Design Item ID=ICP-20100, MF="TDK InvenSense", MP=ICP-20100, Pins=10, Price=None, SnapEDA_Link=https://www.snapeda.com/parts/ICP-20100/TDK%20InvenSense/view-part/7331147/?ref=snap, Source=ICP-20100.SchLib
SW1: library part CMP-05618-000001-1, "SWITCH TACTILE SPST-NO 0.05A 12V", Contact Current Rating=50mA, Contact Resistance=500mΩ, Manufacturer=Panasonic, Operating Force=1.6N, Package=0, Temperature="-20°C to +70°C", Temperature Range High=+70°C, Temperature Range Low=-20°C, Voltage Rating Dc=12V, Automotive=No, Category=Switch, ComponentLink2Description=Datasheet, ComponentLink2URL=https://b2b-api.panasonic.eu/file_stream/pids/fileversion/2431, Device Class L1=Electromechanical, Device Class L2=Switches, Device Class L3="Tactile Switches", Digikey Description="SWITCH TACTILE SPST-NO 0.05A 12V", Electromechanical Life=100000Cycles, Height=1.55mm, Lead Free=Yes, Manufacturer Part Number=EVQ-P7J01P, Mount="Surface Mount", Mouser Description="Tactile Switches 3.5x2.9mm Right Ang Light Touch Switch", Octopart=https://octopart.com/evq-p7j01p-panasonic-29917078, RoHS=TRUE, Throw Configuration=SPST-NO

## Free pads (board coordinates)
  round 3 hole 2: 1(3,44) 2(43,44) 3(42,3) 4(3,3)

## Via types
v1: diameter 0.483, hole 0.254, Top Layer to Layer 4, 88 vias
v2: diameter 0.305, hole 0.254, Top Layer to Layer 5, 60 vias
v3: diameter 0.305, hole 0.254, Top Layer to PWR Layer, 28 vias
v4: diameter 0.483, hole 0.254, Top Layer to Bottom Layer, 27 vias
v5: diameter 0.483, hole 0.254, Top Layer to GND Layer, 26 vias
v6: diameter 0.305, hole 0.254, Top Layer to Bottom Layer, 14 vias
v7: diameter 0.483, hole 0.254, Top Layer to Layer 5, 12 vias
v8: diameter 0.508, hole 0.254, Top Layer to Layer 4, 11 vias
v9: diameter 0.305, hole 0.254, Top Layer to Layer 4, 9 vias
v10: diameter 0.508, hole 0.254, Top Layer to Bottom Layer, 6 vias
v11: diameter 0.483, hole 0.254, Top Layer to PWR Layer, 6 vias
v12: diameter 0.508, hole 0.254, Top Layer to Layer 5, 4 vias
v13: diameter 0.508, hole 0.254, Top Layer to GND Layer, 3 vias
v14: diameter 0.508, hole 0.254, Top Layer to PWR Layer, 1 vias

## Nets (pads, with @x,y where several pads share a name; then routed paths per layer and width w, separated by ;. In a path a pad name is that pad's centre, name@x,y a point inside that pad or via, vN(x,y) a via of type N, cw(c..) or ccw(c..) an arc to the next point about the centre after c; other vN are vias at no path point)
BOOT0: MCU1_.E8 R4.2 R5.2 | length 57.2
  Top Layer w0.076: v7(22.3,18.6) MCU1_.E8@22.7,18.2
  Top Layer w0.203: R4.2@5.075,38.55 R5.2@6.12,38.55 v2(6.12,39.19)
  Layer 5 w0.076: 22.184,22.929 22.36,22.753 22.36,22.415 22.7,22.075 ; v7(22.3,18.6) 22.7,19 22.7,22.075 ; 22.7,22.148 22.7,22.075
  Layer 5 w0.127: v2(6.12,39.19) 1.212,34.282 1.212,18.247 1.912,17.547 3.197,17.547 3.397,17.747 3.397,19.727 3.212,19.913 3.212,21.892 3.772,22.453 4.332,22.453 4.961,23.082 19.663,23.082 20.345,23.763 20.345,23.894 20.55,24.1 21.013,24.1 22.184,22.929
CAN1_H: IC12.7 J1.79 R20.1 | length 5.1
  Top Layer w0.127: J1.79@29.3,33.645 29.334,33.611 29.334,32.641 30.082,31.893 30.984,30.991 30.984,30.516 IC12.7@31.034,30.466 ; v4(29.5,31.855) 30.047,31.855 30.084,31.891
  Bottom Layer w0.127: v4(29.5,31.855) 30.085,31.855 R20.1@30.096,31.843
CAN1_L: IC12.6 J1.81 R20.2 | length 5.3
  Top Layer w0.127: J1.81@29.7,33.645 29.7,32.775 31.517,30.958 31.517,30.633 IC12.6@31.625,30.525 ; 31.016,31.486 31.306,31.775 31.632,31.775 v4(31.7,31.843)
  Bottom Layer w0.127: R20.2@31.121,31.843 v4(31.7,31.843)
DEBUG_SWCLK: J1.51 MCU1_.B14 | length 1.7
  Top Layer w0.076: MCU1_.B14@27.5,20.6 27.9,21 27.9,22.148
DEBUG_SWDIO: J1.49 MCU1_.C15 | length 2.5
  Top Layer w0.076: MCU1_.C15@28.3,19.8 v1(28.7,20.2)
  Layer 4 w0.076: v1(28.7,20.2) 30.648,20.2
FDCAN1_RX: IC12.4 MCU1_.D13 | length 24.1
  Top Layer w0.076: MCU1_.D13@26.7,19 v1(27.1,19.4)
  Top Layer w0.203: v6(32.275,26.875) IC12.4@32.275,27.55
  Layer 4 w0.076: v1(27.1,19.4) 27.5,19.8 27.5,22.075 ; 27.5,22.148 27.5,22.075 ; 28.466,22.929 27.612,22.075 27.5,22.075
  Layer 4 w0.127: 28.466,22.929 28.803,23.266 28.803,23.372 28.729,23.446 28.34,23.446 28.149,23.256 27.76,23.256 27.5,23.516 27.5,23.884 27.76,24.145 v10(30.756,24.145)
  Bottom Layer w0.127: v10(30.756,24.145) 28.15,24.145 26.973,22.967 26.605,22.967 26.322,23.25 26.322,23.606 29.336,26.62 32.223,26.62
  Bottom Layer w0.203: 32.223,26.62 32.256,26.653 32.256,26.856 v6(32.275,26.875)
FDCAN1_TX: IC12.1 MCU1_.E12 | length 23.5
  Top Layer w0.076: MCU1_.E12@25.9,18.2 v7(26.3,18.6)
  Top Layer w0.203: v6(30.325,26.875) IC12.1@30.325,27.55
  Layer 5 w0.076: 25.9,22.148 25.9,22.075 ; v7(26.3,18.6) 25.9,19 25.9,22.075 ; 30.176,22.929 29.322,22.075 25.9,22.075
  Layer 5 w0.127: 30.176,22.929 v10(31.391,24.145)
  Bottom Layer w0.076: 26.284,22.929 26.423,22.789 27.358,22.789 27.497,22.929
  Bottom Layer w0.127: 26.284,22.929 26.068,23.145 26.068,23.712 29.232,26.875 v6(30.325,26.875) ; 27.497,22.929 27.789,23.221 30.468,23.221 v10(31.391,24.145)
FMU_CAP1: IC4.14 J1.2 | length 4.4
  Top Layer w0.127: IC4.14@10.975,39.315 11.025,39.265 11.025,38.785 12.806,37.004 13.361,37.004 13.649,36.716 13.649,36.407 J1.2@13.7,36.355
FMU_CAP2: IC4.15 J1.4 | length 4.4
  Top Layer w0.127: IC4.15@11.475,39.315 11.475,38.743 12.96,37.258 13.511,37.258 14.049,36.721 14.049,36.407 J1.4@14.1,36.355
FMU_CAP3: IC4.16 J1.6 | length 4.3
  Top Layer w0.127: IC4.16@11.975,39.315 11.975,38.704 12.219,38.46 12.219,38.455 13.162,37.512 13.657,37.512 14.449,36.721 14.449,36.407 J1.6@14.5,36.355
FMU_CAP4: IC4.17 J1.8 | length 4.2
  Top Layer w0.127: IC4.17@12.475,39.315 12.481,39.309 12.481,38.644 13.359,37.766 13.803,37.766 14.806,36.764 14.848,36.721 14.848,36.407 J1.8@14.9,36.355
FMU_CAP5: IC4.18 J1.12 | length 4.4
  Top Layer w0.127: IC4.18@12.975,39.315 13.052,39.239 13.052,38.904 14.018,37.938 14.473,37.938 15.648,36.762 15.648,36.407 J1.12@15.7,36.355
FMU_CAP6: IC4.19 J1.14 | length 4.2
  Top Layer w0.127: IC4.19@13.475,39.315 13.552,39.239 13.552,38.903 14.263,38.192 14.578,38.192 16.048,36.721 16.048,36.407 J1.14@16.1,36.355
FMU_CAP7: IC4.20 J1.16 | length 4.2
  Top Layer w0.127: IC4.20@13.975,39.315 14.051,39.239 14.051,38.838 14.444,38.446 14.792,38.446 16.448,36.789 16.448,36.407 J1.16@16.5,36.355
FMU_CAP8: IC4.21 J1.18 | length 4
  Top Layer w0.127: IC4.21@14.475,39.315 14.552,39.239 14.552,38.904 14.756,38.7 14.897,38.7 16.806,36.791 16.806,36.664 16.9,36.57 J1.18@16.9,36.355
FMU_CH1: IC3.14 J1.22 | length 3.5
  Top Layer w0.127: J1.22@17.7,36.355 17.7,37.087 19.05,38.437 IC3.14@19.05,39.315
FMU_CH2: IC3.15 J1.24 | length 3.6
  Top Layer w0.127: J1.24@18.1,36.355 18.1,37.037 19.55,38.487 IC3.15@19.55,39.315
FMU_CH3: IC3.16 J1.26 | length 3.6
  Top Layer w0.127: J1.26@18.5,36.355 18.5,36.987 20.05,38.537 IC3.16@20.05,39.315
FMU_CH4: IC3.17 J1.28 | length 3.8
  Top Layer w0.127: J1.28@18.9,36.355 18.9,37.001 20.55,38.651 IC3.17@20.55,39.315 20.72,39.315
FMU_CH5: IC3.18 J1.32 | length 3.5
  Top Layer w0.127: J1.32@19.7,36.355 19.7,37.087 21.05,38.437 IC3.18@21.05,39.315
FMU_CH6: IC3.19 J1.34 | length 3.6
  Top Layer w0.127: J1.34@20.1,36.355 20.1,37.101 21.55,38.551 IC3.19@21.55,39.315
FMU_CH7: IC3.20 J1.36 | length 3.6
  Top Layer w0.127: J1.36@20.5,36.355 20.5,36.987 22.05,38.537 IC3.20@22.05,39.315
FMU_CH8: IC3.21 J1.38 | length 3.6
  Top Layer w0.127: J1.38@20.9,36.355 20.9,37.001 22.55,38.651 IC3.21@22.55,39.315
GND: 40.2 C1.1 C2.1 C3.2 C4.2 C5.2 C6.2 C7.2 C8.2 C9.2 C11.2 C12.2 C13.2 C14.2 C15.2 C19.2 C20.2 C21.2 C22.2 C23.2 C24.2 C25.2 C26.1 C27.2 C28.2 C29.2 C30.2 C31.2 C32.2 C33.2 C34.2 C35.2 C36.2 C37.2 C38.2 C40.2 C41.2 C42.2 C43.2 C44.1 C45.2 C46.2 C47.2 C53.2 C54.2 C55.2 C65.2 C78.2 C79.2 C80.2 C81.2 IC1.5 IC1.7 IC2.2 IC2.9 IC3.11 IC3.12 IC3.13 IC3.22 IC3.25 IC4.11 IC4.12 IC4.13 IC4.22 IC4.25 IC5.11 IC5.21 IC6.11 IC6.21 IC8.5 IC8.7 IC12.2 IC12.9 IC15.8 J1.1 J1.7 J1.10 J1.13 J1.19 J1.20 J1.25 J1.30 J1.31 J1.37 J1.44 MCU1_.A1 MCU1_.A17 MCU1_.B2 MCU1_.B6 MCU1_.C10 MCU1_.C13 MCU1_.C16 MCU1_.F2 MCU1_.G7 MCU1_.G8 MCU1_.G9 MCU1_.G10 MCU1_.G11 MCU1_.G16 MCU1_.H7 MCU1_.H8 MCU1_.H9 MCU1_.H10 MCU1_.H11 MCU1_.J3 MCU1_.J7 MCU1_.J8 MCU1_.J9 MCU1_.J10 MCU1_.J11 MCU1_.J16 MCU1_.J17 MCU1_.K7 MCU1_.K8 MCU1_.K9 MCU1_.K10 MCU1_.K11 MCU1_.K15 MCU1_.L7 MCU1_.L8 MCU1_.L9 MCU1_.L10 MCU1_.L11 MCU1_.L15 MCU1_.M15 MCU1_.N1 MCU1_.N16 MCU1_.P1 MCU1_.R4 MCU1_.R8 MCU1_.T12 MCU1_.U1 MCU1_.U17 O2.2 O2.4 pad.1 pad.2 pad.3 pad.4 R5.1 R55.1 R56.1 R57.1 S1.2 S1.3 S1.6 S1.7 S1.10 S1.11 S2.2 S2.4 S2.6 S2.7 S3.6 S4.2 S4.3 S6.3 S6.8 S6.9 | length 77.9
  Top Layer w0.076: 16.352,8.6 MCU1_.U1@17.1,8.6 ; 16.352,11 MCU1_.P1@17.1,11 ; 16.352,11.8 MCU1_.N1@17.1,11.8 ; 16.352,17.8 17.5,17.8 MCU1_.F2@17.9,17.4 ; 16.352,21 17.5,21 MCU1_.B2@17.9,20.6 ; 16.352,21.4 MCU1_.A1@17.1,21.4 ; v1(18.3,15.4) MCU1_.J3@18.7,15 ; v1(19.1,9.8) MCU1_.R4@19.5,10.2 ; 20.7,22.148 20.7,21 MCU1_.B6@21.1,20.6 ; v5(21.5,13) MCU1_.L7@21.9,13.4 ; v5(21.5,13.8) MCU1_.K7@21.9,14.2 ; v5(21.5,15.4) MCU1_.J7@21.9,15 ; v5(21.5,16.2) MCU1_.H7@21.9,15.8 ; v5(21.5,17) MCU1_.G7@21.9,16.6 ; 22.3,9.527 v1(22.3,9.8) 22.552,10.052 MCU1_.R8@22.7,10.2 ; v5(22.3,13) MCU1_.L8@22.7,13.4 ; v5(22.3,13.8) MCU1_.K8@22.7,14.2 ; v5(22.3,15.4) MCU1_.J8@22.7,15 ; v5(22.3,16.2) MCU1_.H8@22.7,15.8 ; v5(22.3,17) MCU1_.G8@22.7,16.6 ; MCU1_.L9@23.5,13.4 v5(23.9,13) ; MCU1_.K9@23.5,14.2 v5(23.9,13.8) ; MCU1_.J9@23.5,15 v5(23.9,15.4) ; MCU1_.H9@23.5,15.8 v5(23.9,16.2) ; MCU1_.G9@23.5,16.6 v5(23.9,17) ; MCU1_.L10@24.3,13.4 v5(24.7,13) ; MCU1_.K10@24.3,14.2 v5(24.7,13.8) ; MCU1_.J10@24.3,15 v5(24.7,15.4) ; MCU1_.H10@24.3,15.8 v5(24.7,16.2) ; MCU1_.G10@24.3,16.6 v5(24.7,17) ; MCU1_.C10@24.3,19.8 v1(24.7,20.2) ; MCU1_.L11@25.1,13.4 v5(25.5,13) ; MCU1_.K11@25.1,14.2 v5(25.5,13.8) ; MCU1_.J11@25.1,15 v5(25.5,15.4) ; MCU1_.H11@25.1,15.8 v5(25.5,16.2) ; MCU1_.G11@25.1,16.6 v5(25.5,17) ; MCU1_.T12@25.9,9.4 26.3,9 26.3,7.852 ; MCU1_.C13@26.7,19.8 v1(27.1,20.2) ; MCU1_.M15@28.3,12.6 v1(28.7,12.2) ; MCU1_.L15@28.3,13.4 v1(28.7,13) ; MCU1_.K15@28.3,14.2 v1(28.7,13.8) ; MCU1_.N16@29.1,11.8 29.5,11.4 30.648,11.4 ; MCU1_.J16@29.1,15 29.5,15.4 30.648,15.4 ; MCU1_.G16@29.1,16.6 29.5,17 30.648,17 ; MCU1_.C16@29.1,19.8 29.5,20.2 30.648,20.2 ; MCU1_.U17@29.9,8.6 30.648,8.6 ; MCU1_.J17@29.9,15 30.648,15 ; MCU1_.A17@29.9,21.4 30.648,21.4
  Top Layer w0.127: IC1.7@28.1,40.605 IC1.5@29.2,40.605 ; IC2.2@38.2,40.855 38.95,40.855 IC2.9@39.2,40.605 ; S1.3@39.835,27.25 40.523,27.25 40.903,26.87 40.903,26.682 S1.6@41,26.585 S1.7@41.5,26.585 41.5,27.273 41.88,27.653 42.068,27.653 S1.10@42.165,27.75 ; v11(40.983,20.212) 40.983,20.312 S3.6@40.99,20.318
  Top Layer w0.203: v3(42.05,8.085) IC15.8@42.05,8.6
  Top Layer w0.254: IC4.13@10.5,40.29 12.475,40.29 IC4.25@13.225,41.04 ; IC4.12@10.5,41.79 12.475,41.79 IC4.25@13.225,41.04 ; IC4.22@14.975,39.315 14.975,40.142 14.077,41.04 IC4.25@13.225,41.04 ; IC3.13@18.575,40.29 20.55,40.29 IC3.25@21.3,41.04 ; IC3.12@18.575,41.79 20.55,41.79 IC3.25@21.3,41.04 ; IC3.22@23.05,39.315 23.05,40.142 22.152,41.04 IC3.25@21.3,41.04
  Layer 4 w0.076: 16.352,15.4 v1(18.3,15.4) ; 19.1,7.852 v1(19.1,9.8) ; 22.3,7.852 v1(22.3,9.8) ; v1(24.7,20.2) 24.7,22.148 ; v1(27.1,20.2) 27.1,22.148 ; v1(28.7,12.2) 30.648,12.2 ; v1(28.7,13) 30.648,13 ; v1(28.7,13.8) 30.648,13.8
  other v11: 5.715,11.01 2.419,11.325 40.375,13.5 41.632,13.5
IO_3V3_A: C29.1 C34.1 C35.1 IC2.8 IC3.1 IC3.2 IC3.23 IC3.24 IC5.2 IC5.10 IC5.19 | length 62.4
  Top Layer w0.203: C35.1@7.65,30.725 7.688,30.763 8.43,30.763 v3(8.468,30.801) 9.512,30.801 9.55,30.763 IC5.19@9.55,30.725 ; v3(9.05,27.25) IC5.2@9.55,27.25 ; IC5.10@13.525,28.25 C34.1@14.95,28.25 v3(14.95,27.25) ; IC3.23@23.55,39.315 23.55,39.599 23.588,39.637 23.817,39.637 24.025,39.845 IC3.24@24.025,40.29 v3(24.9,40.29) ; IC3.2@23.554,42.761 23.554,42.505 23.588,42.47 23.845,42.47 24.025,42.29 IC3.1@24.025,41.79 24.029,41.786 24.896,41.786 v3(24.9,41.782)
  Top Layer w0.254: C29.1@40.2,42.385 IC2.8@40.2,41.355 40.45,41.355 41.34,42.245 41.34,42.318 v3(41.383,42.362)
  GND Layer w0.254: v3(14.95,27.25) 14.95,38.915 16.732,40.696 24.494,40.696 v3(24.9,40.29)
  PWR Layer w0.203: v3(8.468,30.801) 8.468,29.332 9.05,28.75 v3(9.05,27.25)
  PWR Layer w0.254: v3(9.05,27.25) v3(14.95,27.25) ; v3(24.9,40.29) v3(24.9,41.782) 25.48,42.362 v3(41.383,42.362)
IO_3V3_B: C30.1 C36.1 C37.1 IC2.7 IC4.1 IC4.2 IC4.23 IC4.24 IC6.2 IC6.10 IC6.19 | length 60.5
  Top Layer w0.203: IC4.23@15.475,39.315 15.475,39.6 15.513,39.638 15.743,39.638 15.95,39.845 IC4.24@15.95,40.29 v3(16.9,40.29) ; IC4.2@15.475,42.765 15.475,42.48 15.513,42.442 15.743,42.442 15.95,42.235 IC4.1@15.95,41.79 v3(16.9,41.79) ; C37.1@15.95,30.562 v3(16.726,30.562) 16.802,30.562 16.965,30.725 IC6.19@17.625,30.725 ; v3(17.125,27.25) 17.6,27.25 IC6.2@17.625,27.275 ; IC6.10@21.6,28.25 C36.1@23.025,28.25 v3(23.025,27.25)